# Altium PCB MainPCB.PcbDoc (part 1 of 3)
Units mm, origin at the board's own origin, x right, y up, seen from the top; angles counter-clockwise.
Board outline 200.18 x 193.98 mm, 4 copper layers (Top Layer, PWR, GND, Bottom Layer), stack 1.566 mm thick; 92 components, 81 nets, 391 pads, 267 vias.
Unrouted connection lines stored in the file: 114.
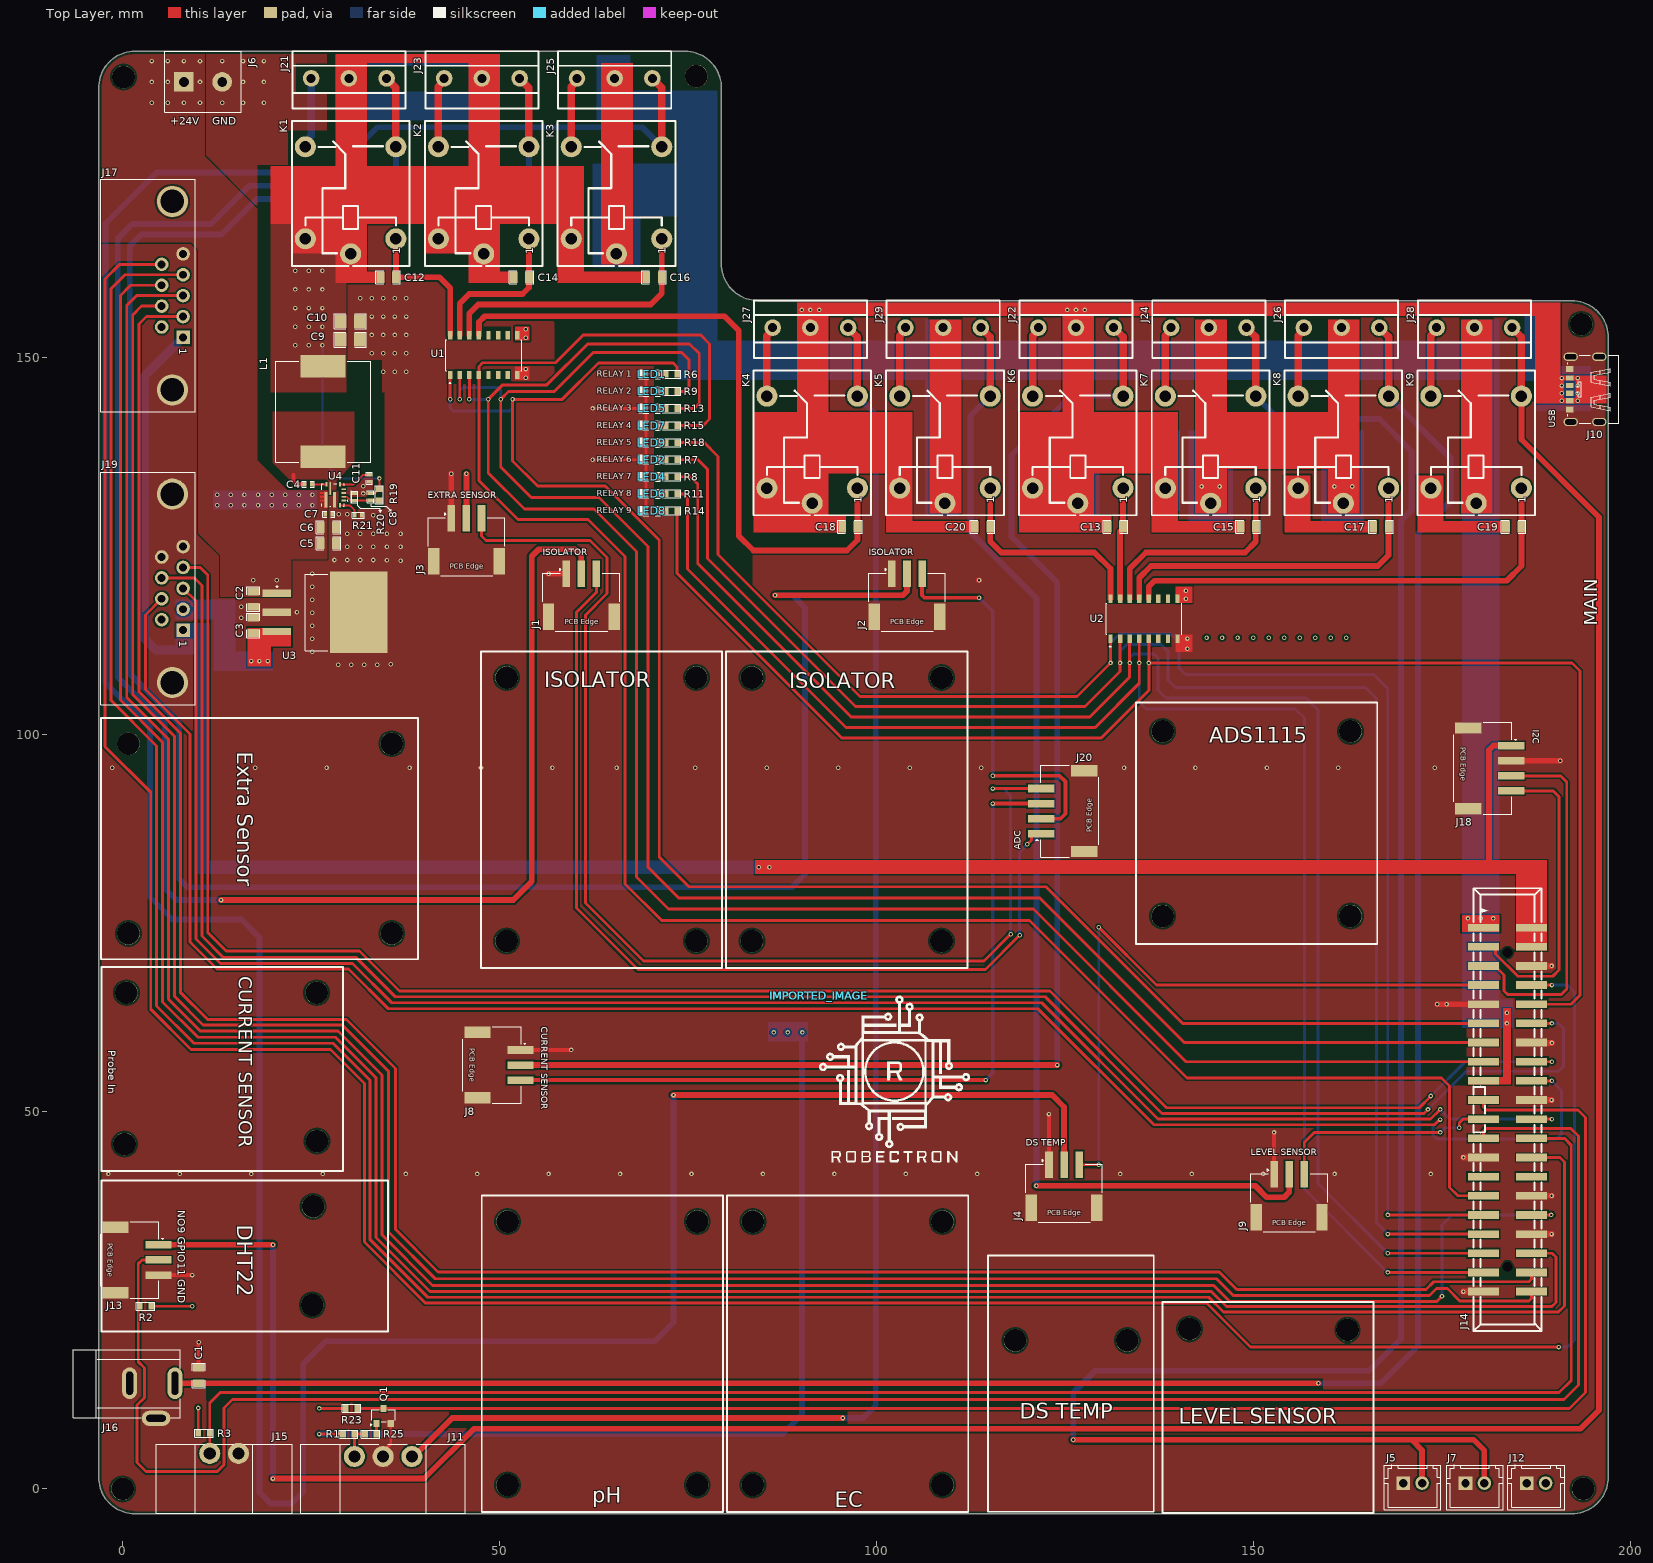
[diagram p0: Top Layer view]
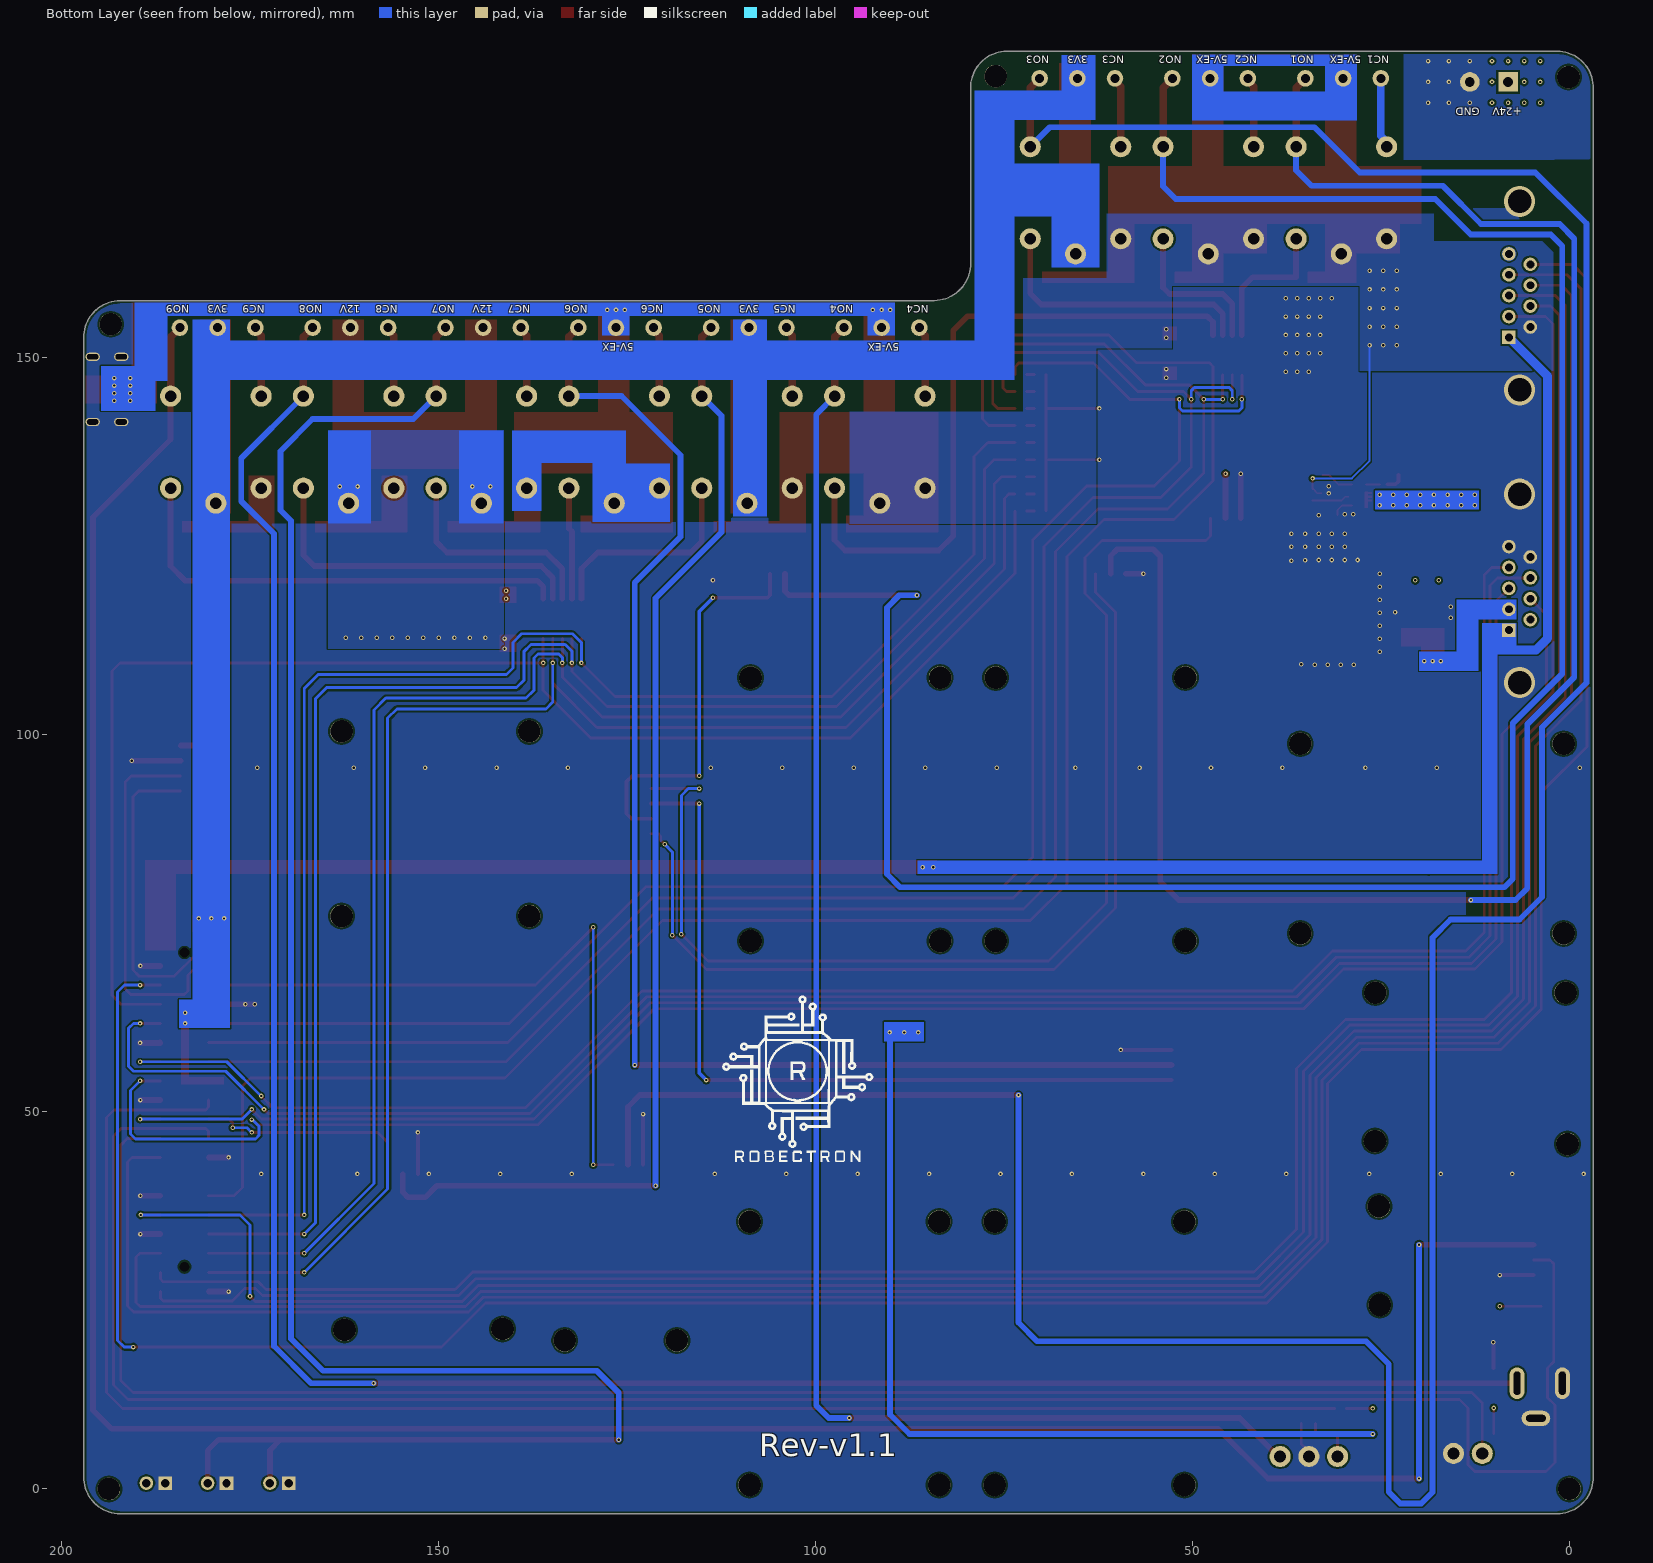
[diagram p1: Bottom Layer view, seen from below]
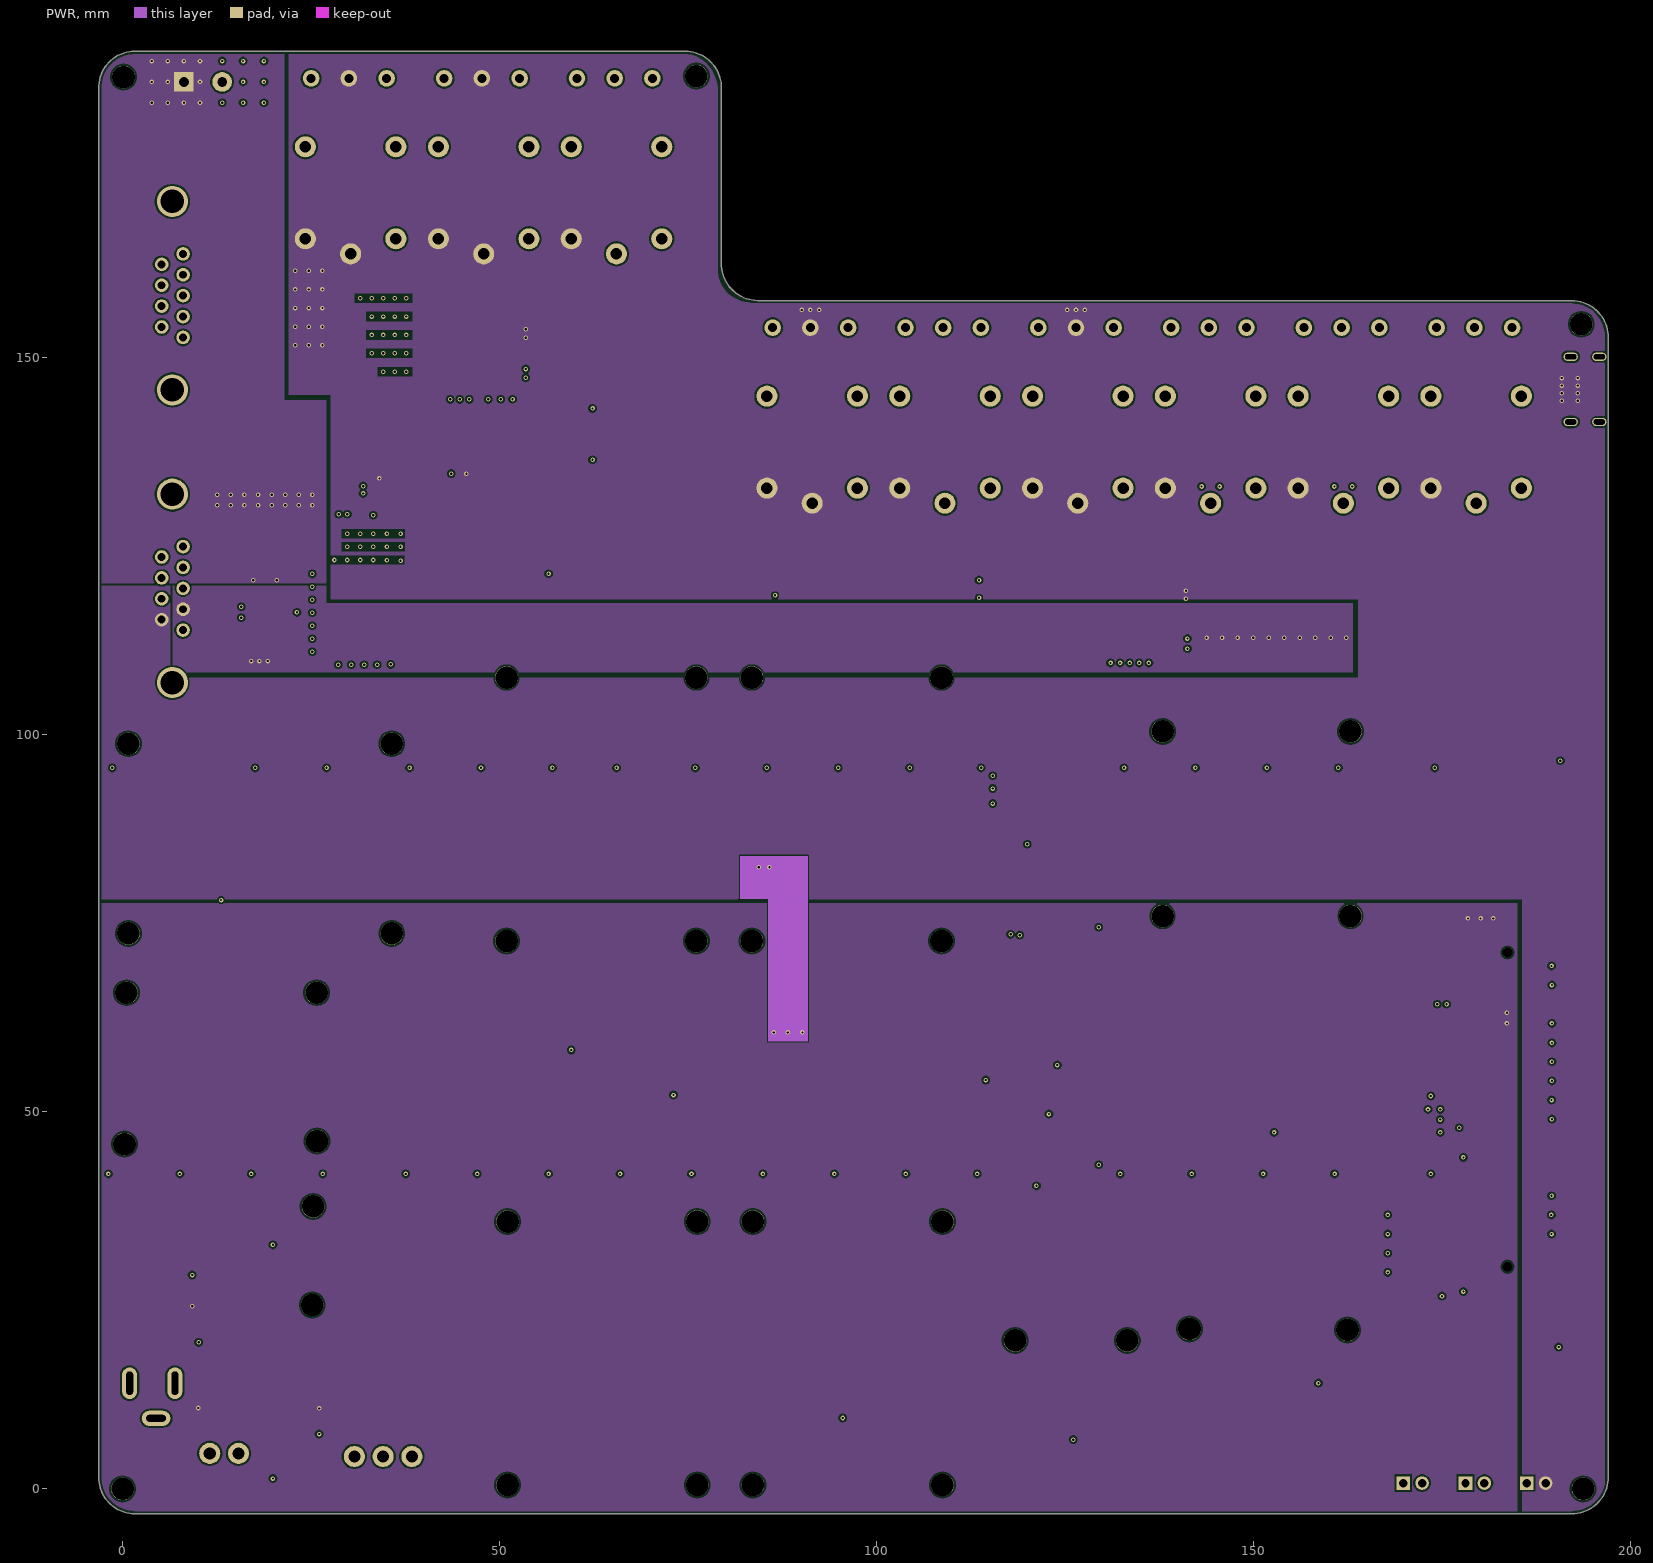
[diagram p2: PWR]
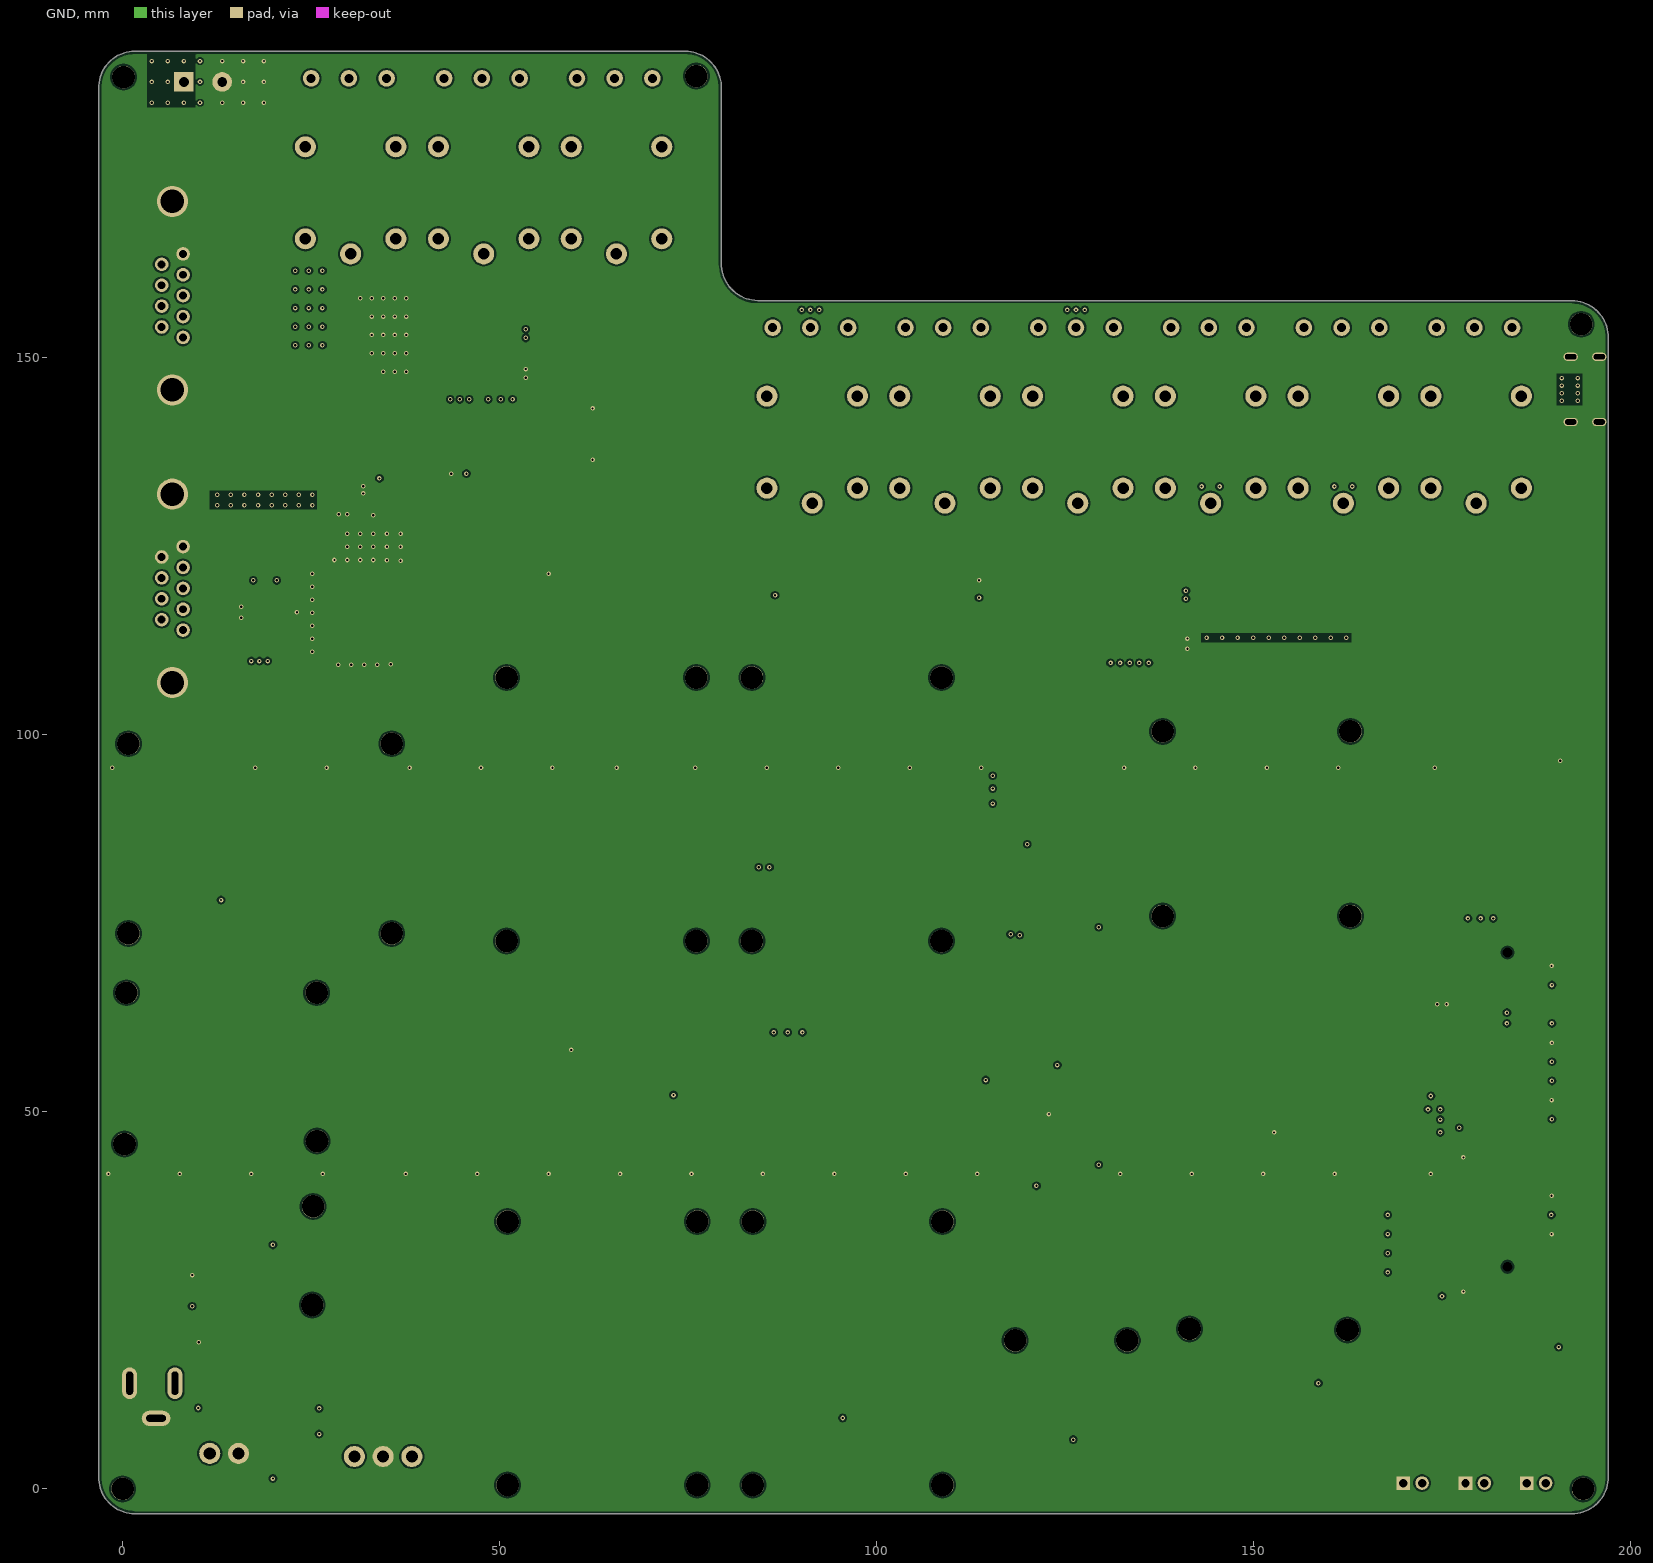
[diagram p3: GND]
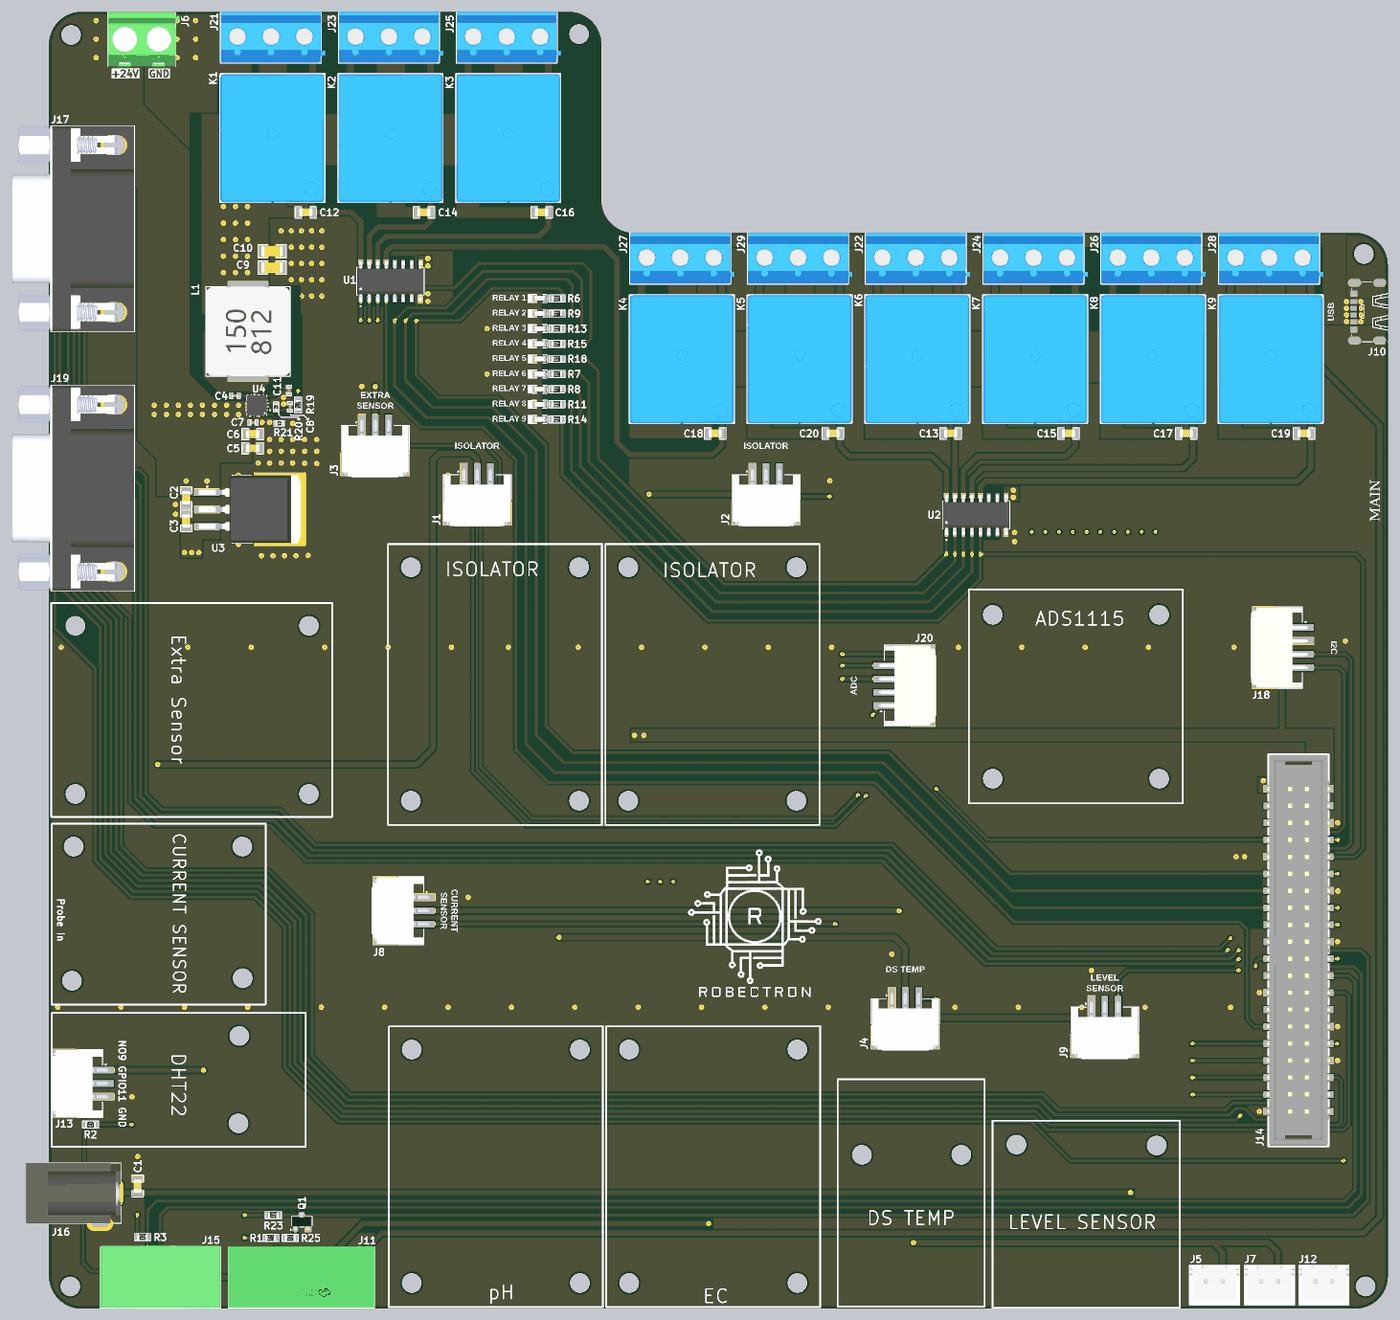
[diagram p5: 3D render of the assembled board from above, using the file's embedded part models]

## Layer stack, top to bottom
Top Solder: solder mask 0.0127, Solder Resist, Dk 3.5
Top Layer: signal copper 0.035
PrePreg 1: prepreg 0.203, PP-006, Dk 4.1
PWR: signal copper 0.03
Core: core 1.03, FR-4, Dk 4.8
GND: signal copper 0.03
PrePreg 2: prepreg 0.203, PP-006, Dk 4.1
Bottom Layer: signal copper 0.035
Bottom Solder: solder mask 0.0127, Solder Resist, Dk 3.5

## Board outline
-3.175,1.629 -3.175,185.698 cw(c1.703,185.774) 1.627,190.652 74.598,190.652 cw(c74.522,185.774) 79.4,185.698 79.4,162.53 ccw(c84.278,162.454) 84.202,157.576 192.198,157.576 cw(c192.122,152.698) 197,152.622 197,1.629 cw(c192.122,1.553) 192.198,-3.325 1.627,-3.325 cw(c1.703,1.553)

## Design rules (kind name [scope] priority, off if disabled: settings)
BoardOutlineClearance [All] p1: gap=0 ignorepadtopadclearanceinfootprint=FALSE except(0.381: Poly-OutlineEdge)
Clearance [All] p1: gap=0.254 ignorepadtopadclearanceinfootprint=FALSE except(0: Arc-Hole Track-Hole SMDPad-Hole THPad-Hole Via-Hole Fill-Hole Poly-Hole Region-Hole Text-Hole; 0.203: Arc-Arc Arc-Track Arc-SMDPad Track-Track Track-SMDPad SMDPad-SMDPad SMDPad-Fill SMDPad-Poly SMDPad-Region Fill-Fill Fill-Poly Fill-Region Poly-Poly Poly-Region Region-Region)
HoleSize [All] p1: absolutevalues=TRUE maxlimit=3.81 minlimit=0.025 maxpercent=80.000 minpercent=20.000
MinimumSolderMaskSliver [All] p1: minsoldermaskwidth=0
PolygonConnect [All] p1: connectstyle=Direct reliefconductorwidth=0.381 reliefentries=4 polygonreliefangle="45 Angle" airgapwidth=0.254
RoutingVias [All] p1: holewidth=0.3 width=0.6 viastyle="Through Hole" minholewidth=0.3 minwidth=0.6 maxholewidth=0.3 maxwidth=0.6
SilkToSilkClearance [All] p1: silktosilkclearance=0
SilkToSolderMaskClearance [IsPad] p1: minsilkscreentomaskgap=0 clearancetoexposedcopper=TRUE
SolderMaskExpansion [All] p1: expansion=0.102 istentingtop=FALSE
UnRoutedNet [All] p1: checkbadconnections=TRUE
Width [All] p1: maxlimit=2 minlimit=0.203 preferedwidth=0.254 midlayer1_minwidth=0.254 midlayer1_maxwidth=0.254 midlayer2_minwidth=0.254 midlayer2_maxwidth=0.254 minimp=50.000000 maximp=50.000000 favimp=50.000000
25 further rules are at their usual default settings.

## Classes and differential pairs
component class U_RelaySheet-v1.1: C12 C13 C14 C15 C16 C17 C18 C19 C20 J21 J22 J23 J24 J25 J26 J27 J28 J29 K1 K2 K3 K4 K5 K6 K7 K8 K9 LED1 LED2 LED3 LED4 LED5 LED6 LED7 LED8 LED9 R6 R7 R8 R9 R11 R13 R14 R15 R18 U1 U2
component class U_ConnectorSheet-v1.1: C1 C2 C3 C4 C5 C6 C7 C8 C9 C10 C11 J1 J2 J3 J4 J5 J6 J7 J8 J9 J10 J11 J12 J13 J14 J15 J16 J17 J18 J19 J20 L1 Q1 R1 R2 R3 R19 R20 R21 R23 R25 U3 U4

## Components (designator, comment, footprint, x,y, rotation, side; value= is the part's Value field where it differs from the comment)
C1 "22uF" Cap-0805 10.084,15.025 r270 top
C2 "10uF" Cap-0805 17.332,117.983 r90 top
C3 "22uF" Cap-0805 17.332,114.503 r270 top
C4 "100nF" cap-0402 24.616,133.209 r180 top
C5 "10uF" Cap-0805 27.279,125.374 r180 top
C6 "10uF" Cap-0805 27.279,127.483 r180 top
C7 "0.1uF" Cap-0402 27.33,129.233 r180 top
C8 "150pF" Cap-0402 32.868,131.547 r90 top
C9 "47uF" Cap-1206 30.175,152.4 r180 top
C10 "47uF" Cap-1206 30.175,154.838 r180 top
C11 "22nF" Cap-0402 32.715,134.01 r90 top
C12 "10uF" Cap-0805 35.223,160.655 r180 top
C13 "10uF" Cap-0805 131.644,127.584 r180 top
C14 "10uF" Cap-0805 52.867,160.655 r180 top
C15 "10uF" Cap-0805 149.252,127.584 r180 top
C16 "10uF" Cap-0805 70.475,160.655 r180 top
C17 "10uF" Cap-0805 166.86,127.584 r180 top
C18 "10uF" Cap-0805 96.427,127.584 r180 top
C19 "10uF" Cap-0805 184.468,127.584 r180 top
C20 "10uF" Cap-0805 114.035,127.584 r180 top
IMPORTED_IMAGE "Comment" IMPORTED_IMAGE 92.364,65.385 r0 top
IMPORTED_IMAGE "Comment" IMPORTED_IMAGE 92.329,65.405 r0 top
J1 "WAFER-PH2.0-3PWB" WAFER-PH2.0-3PWB 60.833,118.491 r0 top
J2 "WAFER-PH2.0-3PWB" WAFER-PH2.0-3PWB 104.013,118.491 r0 top
J3 "WAFER-PH2.0-3PWB" WAFER-PH2.0-3PWB 45.593,125.857 r0 top
J4 "WAFER-PH2.0-3PWB" WAFER-PH2.0-3PWB 124.841,40.132 r0 top
J5 "HX25003-2A" HX25003-2A 171.069,0.762 r0 top locked
J6 "1729128" 1729128 10.668,186.563 r0 top
J7 "HX25003-2A" HX25003-2A 179.324,0.762 r0 top locked
J8 "WAFER-PH2.0-3PWB" WAFER-PH2.0-3PWB 49.911,56.197 r270 top
J9 "WAFER-PH2.0-3PWB" WAFER-PH2.0-3PWB 154.686,38.862 r0 top
J10 "TYPE-C 6P" "TYPE-C 6P" 192.024,141.478 r90 top
J11 "KF2EDGRM-3.81-3P" KF2EDGRM-3.81-3P 34.544,4.293 r0 top locked
J12 "HX25003-2A" HX25003-2A 187.452,0.762 r0 top locked
J13 "WAFER-PH2.0-3PWB" WAFER-PH2.0-3PWB 1.905,30.353 r270 top
J14 "BH-00181" BH-00181 183.642,50.292 r270 top locked
J15 "KF2EDGRM-3.81-2P" KF2EDGRM-3.81-2P 13.462,4.699 r0 top locked
J16 "DC-005-20A" DC-005-20A 3.937,11.684 r0 top locked
J17 "A-DF 09 A/KG-T2S" "A-DF 09 A/KG-T2S" 6.604,158.222 r270 top locked
J18 "WAFER-PH2.0-4PWB" WAFER-PH2.0-4PWB 184.15,98.552 r270 top
J19 "A-DF 09 A/KG-T2S" "A-DF 09 A/KG-T2S" 6.604,119.412 r270 top locked
J20 "WAFER-PH2.0-4PWB" WAFER-PH2.0-4PWB 121.793,86.868 r90 top
J21 "XY301V-A-5.0-3P" XY301V-A-5.0-3P 30.003,187.038 r0 top
J22 "XY301V-A-5.0-3P" XY301V-A-5.0-3P 126.423,153.976 r0 top
J23 "XY301V-A-5.0-3P" XY301V-A-5.0-3P 47.646,187.038 r0 top
J24 "XY301V-A-5.0-3P" XY301V-A-5.0-3P 144.031,153.976 r0 top
J25 "XY301V-A-5.0-3P" XY301V-A-5.0-3P 65.255,187.038 r0 top
J26 "XY301V-A-5.0-3P" XY301V-A-5.0-3P 161.64,153.976 r0 top
J27 "XY301V-A-5.0-3P" XY301V-A-5.0-3P 91.207,153.976 r0 top
J28 "XY301V-A-5.0-3P" XY301V-A-5.0-3P 179.248,153.976 r0 top
J29 "XY301V-A-5.0-3P" XY301V-A-5.0-3P 108.815,153.976 r0 top
K1 "SRD-05VDC-SL-C" SRD-05VDC-SL-C 30.239,170.864 r90 top
K2 "SRD-05VDC-SL-C" SRD-05VDC-SL-C 47.883,170.864 r90 top
K3 "SRD-05VDC-SL-C" SRD-05VDC-SL-C 65.491,170.864 r90 top
K4 "SRD-05VDC-SL-C" SRD-05VDC-SL-C 91.443,137.801 r90 top
K5 "SRD-05VDC-SL-C" SRD-05VDC-SL-C 109.051,137.801 r90 top
K6 "SRD-05VDC-SL-C" SRD-05VDC-SL-C 126.66,137.801 r90 top
K7 "SRD-05VDC-SL-C" SRD-05VDC-SL-C 144.268,137.801 r90 top
K8 "SRD-05VDC-SL-C" SRD-05VDC-SL-C 161.876,137.801 r90 top
K9 "SRD-05VDC-SL-C" SRD-05VDC-SL-C 179.484,137.801 r90 top
L1 "4.7uH" SMD,13.5x12.6mm 26.568,142.85 r90 top locked
LED1 "LTST-C193KRKT-5A" LED-0603 70.168,147.789 r180 top
LED2 "LTST-C193KRKT-5A" LED-0603 70.168,136.471 r180 top
LED3 "LTST-C193KRKT-5A" LED-0603 70.168,145.525 r180 top
LED4 "LTST-C193KRKT-5A" LED-0603 70.168,134.208 r180 top
LED5 "LTST-C193KRKT-5A" LED-0603 70.168,143.262 r180 top
LED6 "LTST-C193KRKT-5A" LED-0603 70.168,131.944 r180 top
LED7 "LTST-C193KRKT-5A" LED-0603 70.168,140.998 r180 top
LED8 "LTST-C193KRKT-5A" LED-0603 70.168,129.681 r180 top
LED9 "LTST-C193KRKT-5A" LED-0603 70.168,138.735 r180 top
Q1 "MMBT2222A-7-F" SOT-23 34.608,9.661 r0 top locked
R1 "10K" Res-0603 29.972,7.264 r180 top locked value=10kR
R2 "4.7K" Res-0603 3.023,24.207 r180 top
R3 "10K" Res-0603 10.795,7.366 r0 top
R6 "220R" Res-0603 72.771,147.789 r0 top
R7 "220R" Res-0603 72.771,136.471 r0 top
R8 "220R" Res-0603 72.771,134.208 r0 top
R9 "220R" Res-0603 72.771,145.525 r0 top
R11 "220R" Res-0603 72.771,131.944 r0 top
R13 "220R" Res-0603 72.771,143.262 r0 top
R14 "220R" Res-0603 72.771,129.681 r0 top
R15 "220R" Res-0603 72.771,140.998 r0 top
R18 "220R" Res-0603 72.771,138.735 r0 top
R19 "30K" Res-0603 34.061,131.826 r90 top
R20 "4.12K" Res-0402 30.763,131.529 r270 top value=4.12kR
R21 "30.1K" Res-0402 31.233,129.102 r180 top
R23 "10K" Res-0603 30.353,10.661 r0 top locked value=10kR
R25 "1.1k" Res-0603 32.896,7.264 r0 top locked
U1 "ULN2003AIDR" "16-SOIC (0.154\", 3.90mm Width)" 47.883,150.343 r90 top
U2 "ULN2003AIDR" "16-SOIC (0.154\", 3.90mm Width)" 135.445,115.394 r90 top locked
U3 "LM340SX-12/NOPB" "TO-263 (DDPAK-3)" 25.888,116.23 r270 top
U4 "TPS56837HRPAR" "10-VQFN-HR (3x3)" 28.128,131.809 r180 top

## Footprints (in the part's own frame and the unit in brackets; to place one, negate y for a bottom-side part, rotate by r counter-clockwise, add the part's x,y. Pads: shape width x height; smd on the part's side, far side on the other; paste and mask are expansions set on the pad)
"10-VQFN-HR (3x3)" [mm]
  rect 0.6x0.25 smd paste+0 mask+0.07: 1(-1.175,0.75) 2(-1.175,0.25) 3(-1.175,-0.25) 4(-1.175,-0.75)
  rect 0.25x0.6 smd paste+0 mask+0.07: 5(-0.705,-1.4) 7(1.095,-1.4) 10(-0.705,1.4)
  rect 0.25x1.7 smd paste+0 mask+0.07: 6(0.595,-0.85)
  rrect50% 0.4x2.1 smd mask+0.07: 8(1.175,0.65)
  rect 0.4x2.1 smd paste+0 mask+0.07: 9(0.015,0.65)
  Top Layer region: 287 vertices and 0 holes, not listed, extent 0.975,-0.4 1.936,1.7
  silkscreen extent -1.76,-1.5 1.73,1.5, body extent -1.27,-1.5 1.73,1.5, height 1
"16-SOIC (0.154\", 3.90mm Width)" [mm]
  rect 1.12x0.58 smd: 1(-2.64,4.445) 2(-2.64,3.175) 3(-2.64,1.905) 4(-2.64,0.635) 5(-2.64,-0.635) 6(-2.64,-1.905) 7(-2.64,-3.175) 8(-2.64,-4.445) 9(2.64,-4.445) 10(2.64,-3.175) 11(2.64,-1.905) 12(2.64,-0.635) 13(2.64,0.635) 14(2.64,1.905) 15(2.64,3.175) 16(2.64,4.445)
  silkscreen extent -3.74,-5.03 2.06,5.03, body extent -3,-4.95 3,4.95, height 1.75
1729128 [mm]
  rect 2.6x2.6 hole 1.32: 1(-2.54,0)
  round 2.6 hole 1.3: 2(2.54,0)
  silkscreen extent -5.08,-4.05 5.08,4.1, body extent -5.06,-4.09 5.67,4.06, height 9.97
"A-DF 09 A/KG-T2S" [mm]
  rect 1.8x1.8 / inner round 1.8 / far side rect 1.8x1.8 hole 1.05: 1(5.54,1.42)
  round 1.8 hole 1.05: 2(2.77,1.42) 3(0,1.42) 4(-2.77,1.42) 5(-5.54,1.42) 6(4.155,-1.42) 7(1.385,-1.42) 8(-1.385,-1.42) 9(-4.155,-1.42)
  round 4.116 hole 3.1: S1(-12.495,0) S2(12.495,0)
  silkscreen extent -15.41,-9.5 15.41,3, body extent -15.41,-15.4 15.41,2.9, height 12.8
BH-00181 [mm]
  rect 1.02x4.1 smd paste+0 mask+0.05: 1(-24.13,-3.2) 2(-24.13,3.2) 3(-21.59,-3.2) 4(-21.59,3.2) 5(-19.05,-3.2) 6(-19.05,3.2) 7(-16.51,-3.2) 8(-16.51,3.2) 9(-13.97,-3.2) 10(-13.97,3.2) 11(-11.43,-3.2) 12(-11.43,3.2) 13(-8.89,-3.2) 14(-8.89,3.2) 15(-6.35,-3.2) 16(-6.35,3.2) 17(-3.81,-3.2) 18(-3.81,3.2) 19(-1.27,-3.2) 20(-1.27,3.2) 21(1.27,-3.2) 22(1.27,3.2) 23(3.81,-3.2) 24(3.81,3.2) 25(6.35,-3.2) 26(6.35,3.2) 27(8.89,-3.2) 28(8.89,3.2) 29(11.43,-3.2) 30(11.43,3.2) 31(13.97,-3.2) 32(13.97,3.2) 33(16.51,-3.2) 34(16.51,3.2) 35(19.05,-3.2) 36(19.05,3.2) 37(21.59,-3.2) 38(21.59,3.2) 39(24.13,-3.2) 40(24.13,3.2)
  round 0 hole 1.3 unplated paste+0: ""(-20.835,0) ""(20.835,0)
  silkscreen extent -29.35,-4.5 29.35,4.5, body extent -29.2,-4.75 29.2,4.75, height 10.5
cap-0402 [mil]
  rect 18x25 smd mask+2.36: 1(-18.5,0) 2(18.5,0)
  silkscreen extent -31,-16 31,16, body extent -20,-10 20,10, height 19
Cap-0402 [mil]
  rect 18x25 smd mask+2.36: 1(-18.5,0) 2(18.5,0)
  silkscreen extent -31,-16 31,16, body extent -20,-10 20,10, height 19
Cap-0805 [mil] "SMD 0805"
  rect 40x60 smd mask+2.76: 1(-40,0) 2(40,0)
  silkscreen extent -64,-34 64,34, body extent -39,-25 39,25, height 30
Cap-1206 [mil] "SMD 1206"
  rect 60x70 smd: 1(-50,0) 2(50,0)
  silkscreen extent -84,-39 84,39, body extent -63,-31 63,32, height 39
DC-005-20A [mm]
  oval 2x4.2 hole 0.9 slot 3.1 at 90 deg copper offset 0.001,0 paste+0 mask+0.051: 1(2.999,2.325)
  oval 2x4.2 hole 0.9 slot 3.1 at 90 deg copper offset 0,0 paste+0 mask+0.051: 2(-2.999,2.325)
  oval 3.8x2 hole 0.9 slot 2.6 at 0 deg copper offset 0.001,0 paste+0 mask+0.051: 3(0.499,-2.325)
  silkscreen extent -10.51,-2.24 3.71,6.78, body extent -10.5,-2.53 3.6,6.77, height 9.9
HX25003-2A [mm]
  rect 1.8x1.8 hole 1.1 paste+0 mask+0.05: 1(-1.25,0)
  round 1.8 hole 1.1 paste+0 mask+0.05: 2(1.25,0)
  silkscreen extent -3.75,-3.55 3.75,2.41, body extent -3.75,-3.5 3.75,2.4, height 7.3
IMPORTED_IMAGE [mm]
  silkscreen extent 0,-22.06 20,0
KF2EDGRM-3.81-2P [mm]
  round 2.8 hole 1.6 paste+0 mask+0.051: 1(-1.905,0) 2(1.905,0)
  silkscreen extent -9.01,-7.95 9.01,1.25, body extent -9.01,-7.95 9.01,1.35, height 6.9
KF2EDGRM-3.81-3P [mm]
  round 2.8 hole 1.6 paste+0 mask+0.051: 1(-3.81,0) 2(0,0) 3(3.81,0)
  silkscreen extent -10.91,-7.54 10.92,1.66, body extent -10.91,-7.47 10.91,1.68, height 7
LED-0603 [mm]
  rect 0.5x1 smd: 1(-0.75,0) 2(0.75,0)
  silkscreen extent -1.12,-0.66 1.75,0.66, body extent -0.82,-0.37 0.82,0.36, height 0.68
Res-0402 [mil]
  rect 18x25 smd mask+2.17: 1(-18.5,0) 2(18.5,0)
  silkscreen extent -32,-17 32,16, body extent -23,-11 23,11, height 16
Res-0603 [mil]
  rect 30x35 smd: 1(-30,0) 2(30,0)
  silkscreen extent -48,-21 48,21, body extent -31,-17 31,17, height 18
SMD,13.5x12.6mm [mm]
  rect 3x6 smd paste+0 mask+0.051: 1(-6,0) 2(6,0)
  silkscreen extent -6.71,-6.33 6.69,6.28, body extent -6.73,-6.3 6.73,6.3, height 4.81
SOT-23 [mm] "TRANS NPN 40V 0.6A SOT23"
  rect 0.82x0.92 smd: 1(-0.95,-1) 2(0.95,-1) 3(0,1)
  silkscreen extent -1.68,-1.3 1.55,0.81, body extent -1.5,-1.25 1.5,1.25, height 1.05
SRD-05VDC-SL-C [mil]
  round 110 hole 60 paste+0 mask+2: 1(-200.79,-236.22) 2(279.52,-236.2) 3(279.53,236.2) 4(-200.79,236.22) 5(-279.53,0)
  silkscreen extent -342,-307 413,307, body extent -343,-307 413,307, height 642
"TO-263 (DDPAK-3)" [mm]
  rect 0.99x3.79 smd: 1(-2.54,-5.44) 2(0,-5.44) 3(2.54,-5.44)
  rect 10.84x7.62 smd paste-6: 4(0,5.44)
  silkscreen extent -5.08,-5.54 5.08,1.31, body extent -5.08,-6.68 5.08,8.56, height 4.83
"TYPE-C 6P" [mm]
  oval 1.1x1.9 hole 0.7 slot 1.5 at 90 deg paste+0 mask+0.051: 7(0,0) 7(0,-3.8) 7(8.64,-3.8) 7(8.64,0)
  rect 0.7x1 smd paste-100 mask+0.051: A5(3.82,0.125) A9(5.82,0.125) B5(4.82,0.125) B9(2.82,0.125)
  rect 0.8x1 smd paste-100 mask+0.051: A12(7.02,0.125) B12(1.62,0.125)
  silkscreen extent -0.18,-6.4 8.82,0.4
WAFER-PH2.0-3PWB [mm]
  rect 1x3.5 smd: 1(-2,2.85) 2(0,2.85) 3(2,2.85)
  rect 1.5x3.5 smd: MP1(-4.35,-2.85) MP2(4.35,-2.85)
  silkscreen extent -5.09,-4.78 5.09,3.56, body extent -5,-4.72 5,3.78, height 5.53
WAFER-PH2.0-4PWB [mm]
  rect 1x3.5 smd: 1(0,0) 2(2,0) 3(4,0) 4(6,0)
  rect 1.5x3.5 smd: MP1(-2.35,-5.7) MP2(8.35,-5.7)
  silkscreen extent -3.09,-7.63 9.09,0.71, body extent -3,-7.57 9,0.91, height 5.59
XY301V-A-5.0-3P [mm]
  round 2.2 hole 1.2 paste+0 mask+0.051: 1(-5,0) 2(0,0) 3(5,0)
  silkscreen extent -7.5,-4 7.5,3.6, body extent -7.5,-4 8.1,3.6, height 10.3

## Part data
C1 C3: library part C2012X5R1V226MT000E, "CAP CER 22UF 35V X5R 0805", LCSC Part Number=C338080, Manufacturer="TDK Corporation", Package=0805, ComponentLink1Description=LCSC, ComponentLink1URL=https://www.lcsc.com/product-detail/Multilayer-Ceramic-Capacitors-MLCC-SMD-SMT_TDK-C2012X5R1V226M125AC_C2179409.html, Item Type=Capacitor, Manufacturer Part Number=C2012X5R1V226MT000E
C2 C5 C6 C12 C13 C14 C15 C16 C17 C18 C19 C20: library part GRM21BR61H106ME43L, "CAP CER 10UF 50V X5R 0805", LCSC Part Number=C2190942, Manufacturer=Murata, Supplier Part Number 1=490-18664-1-ND, Category="Ceramic Capacitors", Manufacturer Part Number=GRM21BR61H106ME43L, Pricing 1="1=0.44000, 10=0.30700, 50=0.21500, 100=0.18420, 500=0.13818, 1000=0.11668 (USD)", RoHS=Yes, Stock 1=26, Supplier 1=Digi-Key
C4: library part C1005X7R1H104KT000F, "CAP CER 0.1UF 50V X7R 0402", Dielectric=X7R, LCSC Part Number=C361198, Manufacturer=TDK, Tolerance=10%, Voltage=25V, Category="Ceramic Capacitors", ComponentLink1Description=LCSC, ComponentLink1URL=https://www.lcsc.com/product-detail/Multilayer-Ceramic-Capacitors-MLCC-SMD-SMT_TDK-C1005X7R1H104KT000F_C361198.html, Item Type=Capacitor, Manufacturer Part Number=C1005X7R1H104KT000F, RoHS=No, Supplier 1=Avnet, Supplier Part Number 1=C1005X7R1H104KT000F
C7: library part C1005X5R1H104K050BB, "CAP CER 0.1UF 50V X5R 0402", Capacitance=100nF, Case Code (Imperial)=0402, Case Code (Metric)=1005, Dielectric=X5R, Dielectric Material=Ceramic, LCSC Part Number=C2181865, Manufacturer=TDK, Max Operating Temperature=85°C, Min Operating Temperature=-55°C, Package Quantity=1, Supplier Part Number 1=445-5942-1-ND, Tolerance=10%, Voltage=50V, Case/Package=0402, ComponentLink1Description=https://product.tdk.com/info/en/catalog/spec/mlccspec_commercial_general_midvoltage_en.pdf?src-supplier=Digi-Key, ComponentLink1URL=https://product.tdk.com/info/en/catalog/spec/mlccspec_commercial_general_midvoltage_en.pdf?src-supplier=Digi-Key, ComponentLink2Description=http://www.tdk.co.jp/tefe02/e413_c.pdf?src-supplier=Future+Electronics, ComponentLink2URL=http://www.tdk.co.jp/tefe02/e413_c.pdf?src-supplier=Future+Electronics, ComponentLink3Description=https://www.verical.com/server-webapp/html/getDatasheet?partID=743571&src-supplier=Verical, ComponentLink3URL=https://www.verical.com/server-webapp/html/getDatasheet?partID=743571&src-supplier=Verical, ComponentLink4Description=http://www.tdk.co.jp/tefe02/e412_c.pdf?src-supplier=Avnet+Europe, ComponentLink4URL=http://www.tdk.co.jp/tefe02/e412_c.pdf?src-supplier=Avnet+Europe, Construction=Flat, Depth=0.5mm, Height=0.5mm, Item Type=Capacitor, Lead Free="Lead Free", Length=1mm, Manufacturer Part Number=C1005X5R1H104K050BB, Mount="Surface Mount", Packaging="Tape and Reel", Pricing 1="1=0.12, 10=0.09, 50=0.049, 100=0.04, 500=0.02858, 1000=0.02245, 2500=0.02041, 5000=0.01878 (USD)", Radiation Hardening=No, REACH SVHC="No SVHC", Resistor Type=Ceramic, RoHS Compliant=Yes, Series=C, Stock 1=1455182, Supplier 1=Digi-Key, Termination=SMD/SMT, Thickness=0.022inch, Voltage Rating=50V, Voltage Rating (DC)=50V, Weight=2.3E-05oz, Width=0.02inch
C8: library part CC0402KRX7R8BB151, "CAP CER 150PF 25V X7R 0402", Case Code (Imperial)=0402, Case Code (Metric)=1005, Dielectric=X7R, LCSC Part Number=C541384, Manufacturer=Yageo, Max Operating Temperature=125°C, Min Operating Temperature=-55°C, Supplier Part Number=2069488, Tolerance=10%, Voltage Rating=25V, Case/Package=0402, Category="Ceramic Capacitors", ComponentLink1Description=https://datasheet.ciiva.com/13210/upy-gphc-x7r-6-3v-to-50v-8-12304-13210062.pdf?src-supplier=Mouser, ComponentLink1URL=https://datasheet.ciiva.com/13210/upy-gphc-x7r-6-3v-to-50v-8-12304-13210062.pdf?src-supplier=Mouser, Halogen Free="Halogen Free", Item Type=Capacitor, Lead Free="Lead Free", Length=0.039inch, Manufacturer Part Number=CC0402KRX7R8BB151, Mounting Technology="Surface Mount", Packaging="Tape and Reel", Pricing="10000=0.0032, 40000=0.003, 150000=0.0029, 400000=0.0028, 1000000=0.0026 (USD)", RoHS=Yes, RoHS Compliant=Yes, Series=CC, Stock=40000, Supplier="Future Electronics", Termination=SMD/SMT, Thickness=0.022inch, Voltage Rating (DC)=25V, Weight=2.3E-05oz, Width=0.02inch
C9 C10: library part C3216X5R1E476M160AC, "CAP CER 47UF 25V X5R 1206", Case Code (Imperial)=1206, Case Code (Metric)=3216, Dielectric=X5R, Dielectric Material=Ceramic, LCSC Part Number=C2167787, Manufacturer=TDK, Max Operating Temperature=85°C, Min Operating Temperature=-55°C, Package Quantity=1, Supplier Part Number 1=445-8047-1-ND, Tolerance=20%, Voltage=25V, Capacitance=47uF, Case/Package=1206, ComponentLink1Description=https://product.tdk.com/info/en/catalog/datasheets/mlcc_commercial_general_en.pdf?src-supplier=Digi-Key, ComponentLink1URL=https://product.tdk.com/info/en/catalog/datasheets/mlcc_commercial_general_en.pdf?src-supplier=Digi-Key, ComponentLink2Description=https://product.tdk.com/info/en/documents/chara_sheet/C3216X5R1E476M160AC.pdf?src-supplier=Digi-Key, ComponentLink2URL=https://product.tdk.com/info/en/documents/chara_sheet/C3216X5R1E476M160AC.pdf?src-supplier=Digi-Key, ComponentLink3Description=http://www.tdk.com/pdf/general_B11.pdf?src-supplier=Future+Electronics, ComponentLink3URL=http://www.tdk.com/pdf/general_B11.pdf?src-supplier=Future+Electronics, Depth=1.6mm, Height=1.6mm, Lead Free="Lead Free", Length=0.126inch, Manufacturer Part Number=C3216X5R1E476M160AC, Mount="Surface Mount", Packaging="Tape and Reel", Pricing 1="1=1.09, 10=0.862, 50=0.7476, 100=0.6469, 500=0.48876, 1000=0.43125 (USD)", REACH SVHC="No SVHC", Resistor Type=Ceramic, Series=C, Stock 1=886163, Supplier 1=Digi-Key, Termination=SMD/SMT, Thickness=0.071inch, Voltage Rating=25V, Voltage Rating (DC)=25V, Weight=0.000571oz, Width=0.063inch
C11: library part CC0402KRX5R7BB223, "CAP CER 0.022UF 16V X5R 0402", Case Code (Imperial)=0402, Case Code (Metric)=1005, Dielectric=X5R, LCSC Part Number=C541399, Manufacturer=Yageo, Max Operating Temperature=85°C, Min Operating Temperature=-55°C, Supplier Part Number 1=603-CC402KRX5R7BB223, Tolerance=10%, Voltage Rating=16V, Capacitance=22nF, Case/Package=0402, Category="Ceramic Capacitors", ComponentLink1Description=http://www.yageo.com/exep/pages/download/literatures/ProductSelectionGuide%202014_Final_2.pdf?src-supplier=Digi-Key, ComponentLink1URL=http://www.yageo.com/exep/pages/download/literatures/ProductSelectionGuide%202014_Final_2.pdf?src-supplier=Digi-Key, ComponentLink2Description=http://www.yageo.com/documents/recent/UPY-GPHC_X5R_4V-to-50V_25.pdf?src-supplier=Digi-Key, ComponentLink2URL=http://www.yageo.com/documents/recent/UPY-GPHC_X5R_4V-to-50V_25.pdf?src-supplier=Digi-Key, Halogen Free="Halogen Free", Lead Free="Lead Free", Length=0.039inch, Manufacturer Part Number=CC0402KRX5R7BB223, Mount="Surface Mount", Packaging="Tape and Reel", Pricing 1="1=0.10000, 10=0.05600, 50=0.05600, 100=0.02500, 1000=0.01400, 10000=0.01000 (USD)", RoHS=Yes, RoHS Compliant=Yes, Stock 1=31160, Supplier 1=Mouser, Thickness=0.022inch, Voltage Rating (DC)=16V, Width=0.02inch
J1 J2 J3 J4 J8 J9 J13: "1x3P 3P 1 2mm 3 -25℃~+85℃ 2A Surface Mount，Right Angle SMD,P=2mm,Surface Mount，Right Angle Wire To Board Connector ROHS", LCSC Part Number=C3029441, ComponentLink1Description=LCSC, ComponentLink1URL=https://www.lcsc.com/product-detail/Wire-To-Board-Connector_XUNPU-WAFER-PH2-0-3PWB_C3029441.html, Item Type=Connector, Manuacturer=XUNPU, Manufacturer Part Number=WAFER-PH2.0-3PWB
J5 J7 J12: "1x2P 2P XH 1 2.5mm 2 Straight Plugin,P=2.5mm Wire To Board Connector ROHS", LCSC Part Number=C442299, Manufacturer=HX, Package=Plugin,P=2.5mm, ComponentLink1Description=LCSC, ComponentLink1URL=https://www.lcsc.com/product-detail/Wire-To-Board-Connector_HX-Zhejiang-Yueqing-Hongxing-Elec-HX25003-2A_C442299.html, Item Type="Wire To Board Connector", Manufacturer Part Number=HX25003-2A
J6: "TERM BLK 2P SIDE ENT 5.08MM PCB", Color=Green, Current=10A, Current Rating=13.5A, Flammability Rating="UL94 V-0", Manufacturer="Phoenix Contact", Max Supply Voltage=400V, Package Quantity=50, Supplier Part Number=277-1247-ND, Voltage=300V, Approvals=UL,CSA, ComponentLink1Description=https://datasheet.ciiva.com/16046/1729128-16046181.pdf?src-supplier=Onlinecomponents.com, ComponentLink1URL=https://datasheet.ciiva.com/16046/1729128-16046181.pdf?src-supplier=Onlinecomponents.com, ComponentLink2Description=https://datasheet.ciiva.com/15169/getdatasheetpartid-199310-15169845.pdf?src-supplier=Verical, ComponentLink2URL=https://datasheet.ciiva.com/15169/getdatasheetpartid-199310-15169845.pdf?src-supplier=Verical, ComponentLink3Description=https://datasheet.ciiva.com/823/1729128-823779.pdf?src-supplier=Digikey, ComponentLink3URL=https://datasheet.ciiva.com/823/1729128-823779.pdf?src-supplier=Digikey, ComponentLink4Description=https://datasheet.ciiva.com/14607/70054405-14607157.pdf?src-supplier=Allied+Electronics, ComponentLink4URL=https://datasheet.ciiva.com/14607/70054405-14607157.pdf?src-supplier=Allied+Electronics, ComponentLink5Description=https://datasheet.ciiva.com/29218/743664-da-01-en-printklemmenblock-mkdsn-1-5-2-5-08-29218154.pdf?src-supplier=Conrad, ComponentLink5URL=https://datasheet.ciiva.com/29218/743664-da-01-en-printklemmenblock-mkdsn-1-5-2-5-08-29218154.pdf?src-supplier=Conrad, Connector Type=Screw, Contact Material=Tin, Depth=8.1mm, Height=13.5mm, Housing Color=Green, Housing Material=Polyamide, Insulation Material=Nylon, Item Type="Terminal Blocks", Lead Free="Lead Free", Length=8.1mm, Manufacturer Part Number=1729128, Max Current Rating=13.5A, Mounting Technology="Through Hole", Number of Circuits=2, Number of Contacts=2, Number of Levels=1, Number of Poles=2, Number of Positions=2, Number of Positions Per Level=2, Number of Rows=1, Orientation=Straight, Packaging=Bulk, Pins=2, Pitch=5.08mm, Pricing="1=0.77 (USD)", Radiation Hardening=No, Reach SVHC Compliant=No, RoHS=Yes, RoHS Compliant=Yes, Series=MKDSN, Stock=33086, Supplier=Digikey, Termination=Solder, Voltage Rating=400V, Weight=0.069842oz, Width=13.5mm, Wire Gauge (Max)=26AWG, Wire Gauge (Min)=14AWG, Wire/Cable Gauge=26AWG
J10: "1 Surface Mount，Right Angle 6P Female -40℃~+85℃ Type-C SMD USB Connectors ROHS", LCSC Part Number=C456012, Manufacturer="SHOU HAN", Package=SMD, ComponentLink1Description=LCSC, ComponentLink1URL=https://www.lcsc.com/product-detail/USB-Connectors_SHOU-HAN-TYPE-C-6P_C456012.html, Item Type="Type-C SMD", Manufacturer Part Number="TYPE-C 6P"
J11: "300V 8A 3 Bend -40℃~+105℃ 1 3.81mm 1x3P Green Board Edge/Receptacle-Close Screw fixed Push-Pull,P=3.81mm Pluggable System Terminal Block ROHS", LCSC Part Number=C441269, Manufacturer="Cixi Kefa Elec", Package=Push-Pull,P=3.81mm, ComponentLink1Description=LCSC, ComponentLink1URL=https://www.lcsc.com/product-detail/Pluggable-System-Terminal-Block_Cixi-Kefa-Elec-KF2EDGRM-3-81-3P_C441269.html, Item Type="Terminal Block", Manufacturer Part Number=KF2EDGRM-3.81-3P
J14: "2.54mm -40℃~+105℃ Brick nogging 3A 2x20P 20 Push - Pull 2.54mm 2 SMD,P=2.54mm IDC Connectors ROHS", LCSC Part Number=C2685075, Manufacturer=Liansheng, Package=SMD,P=2.54mm, ComponentLink1Description=LCSC, ComponentLink1URL=https://www.lcsc.com/product-detail/IDC-Connectors_Liansheng-BH-00181_C2685075.html, Item Type="IDC Connector", Manufacturer Part Number=BH-00181
J15: "300V 8A 2 Bend -40℃~+105℃ 1 3.81mm 1x2P Green Board Edge/Receptacle-Close Screw fixed Push-Pull,P=3.81mm Pluggable System Terminal Block ROHS", LCSC Part Number=C441268, Manufacturer="Cixi Kefa Elec", Package=Push-Pull,P=3.81mm, ComponentLink1Description=LCSC, ComponentLink1URL=https://www.lcsc.com/product-detail/Pluggable-System-Terminal-Block_Cixi-Kefa-Elec-KF2EDGRM-3-81-2P_C441268.html, Item Type="Terminal Block", Manufacturer Part Number=KF2EDGRM-3.81-2P
J16: "2mm 6.4mm 500mA 30V Plugin DC Power Connector ROHS", LCSC Part Number=C136744, Manufacturer="Korean Hroparts Elec", Package=Plugin, ComponentLink1Description=LCSC, ComponentLink1URL=https://www.lcsc.com/product-detail/DC-Power-Connector_Korean-Hroparts-Elec-DC-005-20A_C136744.html, Item Type="DC Power Connector", Manufacturer Part Number=DC-005-20A
J17 J19: "CONN D-SUB RCPT 9POS R/A SLDR", Manufacturer=Assmann, Supplier Part Number=AE10921-ND, ComponentLink1Description=https://datasheet.ciiva.com/26927/getdatasheetpartid-755627-26927441.pdf?src-supplier=Verical, ComponentLink1URL=https://datasheet.ciiva.com/26927/getdatasheetpartid-755627-26927441.pdf?src-supplier=Verical, Height=12.68mm, Item Type="D-Sub Connectors", Lead Free=5697LeadFree, Manufacturer Part Number="A-DF 09 A/KG-T2S", Number of Contacts=9NUMBER, Pricing="1=0.78, 10=0.661, 25=0.6336, 40=0.62025, 90=0.59322, 270=0.53933, 450=0.4854, 990=0.43147, 2430=0.39102 (USD)", RoHS=Yes, Stock=23990, Supplier=Digikey
J18 J20: "1x4P 1 2mm Male pin 4 -25℃~+85℃ 2A Surface Mount SMD,P=2mm Wire To Board / Wire To Wire Connector ROHS / C3029442", LCSC Part Number=C3029442, ComponentLink1Description=LCSC, ComponentLink1URL=https://www.lcsc.com/product-detail/Wire-To-Board-Wire-To-Wire-Connector_XUNPU-WAFER-PH2-0-4PWB_C3029442.html, Item Type=Connector, Manuacturer=XUNPU, Manufacturer Part Number=WAFER-PH2.0-4PWB
J21 J22 J23 J24 J25 J26 J27 J28 J29: "1x3P 15A 300V Blue 14~22 Straight 5mm 1.5 1 3 Plugin,P=5mm Screw terminal ROHS", LCSC Part Number=C557652, Manufacturer="Ningbo Xinlaiya Elec", Package=Plugin,P=5mm, ComponentLink1Description=LCSC, ComponentLink1URL=https://www.lcsc.com/product-detail/Screw-terminal_Ningbo-Xinlaiya-Elec-XY301V-A-5-0-3P_C557652.html, Item Type="Screw terminal", Manufacturer Part Number=XY301V-A-5.0-3P
K1 K2 K3 K4 K5 K6 K7 K8 K9: "250V@AC 5V 15A SPDT (1 Form C) Plugin,15.6x19.2mm Power Relays ROHS", LCSC Part Number=C35449, Manufacturer="Ningbo Songle Relay", Package=Plugin,15.6x19.2mm, ComponentLink1Description=LCSC, ComponentLink1URL=https://www.lcsc.com/product-detail/Power-Relays_Ningbo-Songle-Relay-SRD-05VDC-SL-C_C35449.html, Item Type=Relays, Manufacturer Part Number=SRD-05VDC-SL-C
L1: library part MWSA1206S-4R7MT, "15A 4.7uH ±20% 24A SMD,13.5x12.6mm Power Inductors ROHS", LCSC Part Number=C408521, Manufacturer=Sunlord, Supplier Part Number=3442-MWSA1206S-4R7MTCT-ND, Item Type=Inductors, Manufacturer Part Number=MWSA1206S-4R7MT, Pricing="1=1.67, 10=1.417, 25=1.3056, 50=1.1666, 100=0.9721, 250=0.94436 (USD)", RoHS=No, Stock=195, Supplier=Digikey
LED1 LED2 LED3 LED4 LED5 LED6 LED7 LED8 LED9: "LED RED CLEAR CHIP SMD", Case Code (Imperial)=0603, Case Code (Metric)=1608, Color=Red, Forward Current=30mA, Forward Voltage=2.3V, Lens Color=Colorless, Manufacturer="Vishay Lite-On", Max Operating Temperature=85°C, Min Operating Temperature=-55°C, Package Quantity=3000, Power Dissipation=75mW, Reverse Voltage=5V, Supplier Part Number=160-1830-1-ND, Test Current=5mA, Case/Package=0603, ComponentLink1Description=https://datasheet.ciiva.com/11775/0900766b80dc0551-11775612.pdf?src-supplier=Rs, ComponentLink1URL=https://datasheet.ciiva.com/11775/0900766b80dc0551-11775612.pdf?src-supplier=Rs, ComponentLink2Description=https://datasheet.ciiva.com/4689/100-ltst-c193krkt-5a-61179-4689123.pdf?src-supplier=Mouser, ComponentLink2URL=https://datasheet.ciiva.com/4689/100-ltst-c193krkt-5a-61179-4689123.pdf?src-supplier=Mouser, ComponentLink3Description=https://datasheet.ciiva.com/16210/ltst-c193krkt-5a-16210822.pdf?src-supplier=Future+Electronics, ComponentLink3URL=https://datasheet.ciiva.com/16210/ltst-c193krkt-5a-16210822.pdf?src-supplier=Future+Electronics, ComponentLink4Description=https://datasheet.ciiva.com/2110/s-110-ltst-c193krkt-5a-2110272.pdf?src-supplier=Digikey, ComponentLink4URL=https://datasheet.ciiva.com/2110/s-110-ltst-c193krkt-5a-2110272.pdf?src-supplier=Digikey, Depth=0.8mm, Dominant Wavelength=631nm, Height=0.45mm, Illumination Color=Red, Item Type=LEDs, Lead Free="Lead Free", Length=1.6mm, Lens Size=0.8mm, Lens Style=Flat,Diffused,Colorless,Rectangular,Clear, Lens Transparency=Clear, Luminous Intensity=45mcd, Manufacturer Part Number=LTST-C193KRKT-5A, Mounting Technology="Surface Mount", Number of Elements=1, Number of LEDs=1, Packaging="Tape and Reel", Pins=2, Pricing="1=0.39, 10=0.211, 100=0.0981, 500=0.0906, 1000=0.07097, 2000=0.06946 (USD)", Radiation Hardening=No, RoHS=Yes, RoHS Compliant=Yes, Series=-, Stock=241564, Supplier=Digikey, Viewing Angle=130°, Wavelength=631nm, Width=0.8mm
Q1: "TRANS NPN 40V 0.6A SMD SOT23-3", Case/Package=SOT-23, Collector Base Voltage (VCBO)=75V, Collector Emitter Breakdown Voltage=40V, Collector Emitter Saturation Voltage=1V, Continuous Collector Current=600mA, Current=1A, Emitter Base Voltage (VEBO)=6V, Frequency=300MHz, LCSC Part Number=C94515, Manufacturer=Diodes, Max Operating Temperature=150°C, Max Power Dissipation=300mW, Min Operating Temperature=-55°C, Package Quantity=3000, Power Dissipation=350mW, Supplier Part Number 1=MMBT2222A-FDIDKR-ND, Collector Emitter Voltage (VCEO)=40V, ComponentLink1Description=http://www.diodes.com/datasheets/ds30041.pdf?src-supplier=Future+Electronics, ComponentLink1URL=http://www.diodes.com/datasheets/ds30041.pdf?src-supplier=Future+Electronics, ComponentLink2Description=http://www.diodes.com/datasheets/ds30041.pdf?src-supplier=Avnet, ComponentLink2URL=http://www.diodes.com/datasheets/ds30041.pdf?src-supplier=Avnet, ComponentLink3Description=https://www.verical.com/server-webapp/html/getDatasheet?partID=82692&src-supplier=Verical, ComponentLink3URL=https://www.verical.com/server-webapp/html/getDatasheet?partID=82692&src-supplier=Verical, ComponentLink4Description=https://www.diodes.com/assets/Datasheets/ds30041.pdf?src-supplier=Digi-Key, ComponentLink4URL=https://www.diodes.com/assets/Datasheets/ds30041.pdf?src-supplier=Digi-Key, ComponentLink5Description=http://www.diodes.com/datasheets/ds30041.pdf?src-supplier=Avnet+Europe, ComponentLink5URL=http://www.diodes.com/datasheets/ds30041.pdf?src-supplier=Avnet+Europe, ComponentLink6Description=http://www.diodes.com/datasheets/ds30041.pdf?src-supplier=Element14, ComponentLink6URL=http://www.diodes.com/datasheets/ds30041.pdf?src-supplier=Element14, Contact Plating=Matte,Tin, Current Rating=600mA, Element Configuration=Single, Gain Bandwidth Product=300MHz, Height=1mm, hFE Min=100, Item Type=Mosfet, Lead Free="Lead Free", Length=3.05mm, Manufacturer Part Number=MMBT2222A-7-F, Max Breakdown Voltage=40V, Max Collector Current=600mA, Max Frequency=300MHz, Mount="Surface Mount", Number of Elements=1, Number of Pins=3, Packaging="Tape and Reel", Polarity=NPN, Pricing 1="1=0.15, 10=0.134, 100=0.0729, 500=0.04486, 1000=0.03059 (USD)", Radiation Hardening=No, REACH SVHC="No SVHC", Stock 1=2471182, Supplier 1=Digi-Key, Termination=SMD/SMT, Transition Frequency=300MHz, Voltage=40V, Voltage Rating (DC)=40V, Weight=0.000282oz, Width=1.4mm
R1 R23: library part RK73G1JTTD1002F, "RES 10K OHM 1% 1/10W 0603", Case Code (Imperial)=0603, Case Code (Metric)=1608, LCSC Part Number=C362180, Max Operating Temperature=125°C, Min Operating Temperature=-55°C, Power Rating=100mW, Supplier Part Number=2019-RK73G1JTTD1002FCT-ND, Temperature Coefficient=50ppm/°C, Tolerance=1%, Voltage Rating=75V, Case/Package=0603, Category="Chip SMD Resistors", ComponentLink1Description=LCSC, ComponentLink2Description=http://www.mouser.com/ds/2/219/RK73G-9863.pdf?src-supplier=Mouser, ComponentLink2URL=http://www.mouser.com/ds/2/219/RK73G-9863.pdf?src-supplier=Mouser, Construction=Rectangular, Depth=0.8mm, Item Type=Resistor, Length=1.6mm, Military Standard=Not, Packaging="Tape and Reel", Pricing="1=0.22, 10=0.118, 50=0.0812, 100=0.0699, 500=0.0513, 1000=0.04545 (USD)", RoHS=Yes, RoHS Compliant=Yes, Series=RK73G, Stock=249394, Supplier=Digi-Key, Termination=SMD/SMT
R2: library part RC0603FR-074K7L, "RES SMD 4.7K OHM 1% 1/10W 0603", LCSC Part Number=C99782, Manufacturer=Yageo, Package=0603, ComponentLink7Description=LCSC, ComponentLink7URL=https://www.lcsc.com/product-detail/Chip-Resistor-Surface-Mount_YAGEO-RC0603FR-074K7L_C99782.html, Item Type=Resistor, Manufacturer Part Number=RC0603FR-074K7L
R3: library part 0603WAF1002T5E, "100mW Thick Film Resistors 75V ±100ppm/℃ ±1% 10kΩ 0603 Chip Resistor - Surface Mount ROHS", LCSC Part Number=C25804, Manufacturer="UNI-ROYAL(Uniroyal Elec)", Package=0603, ComponentLink1Description=LCSC, ComponentLink1URL=https://www.lcsc.com/product-detail/Chip-Resistor-Surface-Mount_UNI-ROYAL-Uniroyal-Elec-0603WAF1002T5E_C25804.html, Item Type=Resistor, Manufacturer Part Number=0603WAF1002T5E
R6 R7 R8 R9 R11 R13 R14 R15 R18: library part CRCW0603220RFKEA, "RES SMD 220 OHM 1% 1/10W 0603", Case Code (Imperial)=0603, Case Code (Metric)=1608, LCSC Part Number=C844757, Max Operating Temperature=155°C, Max Power Dissipation=100mW, Min Operating Temperature=-55°C, Package Quantity=5000, Ratings=AEC-Q200, Resistance Tolerance=1%, Resistor Type="Thick Film", Supplier Part Number=71-CRCW0603-220-E3, Temperature Coefficient=100ppm/°C, Voltage Rating=75V, Case/Package=0603, Category="Chip SMD Resistors", ComponentLink1Description=LCSC, ComponentLink2Description=https://datasheet.ciiva.com/11810/0900766b80d98afc-11810631.pdf?src-supplier=Rs, ComponentLink2URL=https://datasheet.ciiva.com/11810/0900766b80d98afc-11810631.pdf?src-supplier=Rs, ComponentLink3Description=https://datasheet.ciiva.com/8339/dcrcwe3-8339957.pdf?src-supplier=Avnet, ComponentLink3URL=https://datasheet.ciiva.com/8339/dcrcwe3-8339957.pdf?src-supplier=Avnet, ComponentLink4Description=https://datasheet.ciiva.com/16222/dcrcwe3-16222278.pdf?src-supplier=Future+Electronics, ComponentLink4URL=https://datasheet.ciiva.com/16222/dcrcwe3-16222278.pdf?src-supplier=Future+Electronics, ComponentLink5Description=https://datasheet.ciiva.com/7777/1697337-7777301.pdf?src-supplier=Element14, ComponentLink5URL=https://datasheet.ciiva.com/7777/1697337-7777301.pdf?src-supplier=Element14, ComponentLink6Description=https://datasheet.ciiva.com/16763/70201119-16763287.pdf?src-supplier=Allied+Electronics, ComponentLink6URL=https://datasheet.ciiva.com/16763/70201119-16763287.pdf?src-supplier=Allied+Electronics, ComponentLink7Description=https://datasheet.ciiva.com/2466/dcrcwe3-2466464.pdf?src-supplier=Digi-Key, ComponentLink7URL=https://datasheet.ciiva.com/2466/dcrcwe3-2466464.pdf?src-supplier=Digi-Key, ComponentLink8Description=https://datasheet.ciiva.com/2466/dcrcwe3-2466465.pdf?src-supplier=Digi-Key, ComponentLink8URL=https://datasheet.ciiva.com/2466/dcrcwe3-2466465.pdf?src-supplier=Digi-Key, ComponentLink9Description=https://datasheet.ciiva.com/2466/dcrcwe3-2466466.pdf?src-supplier=Digi-Key, ComponentLink9URL=https://datasheet.ciiva.com/2466/dcrcwe3-2466466.pdf?src-supplier=Digi-Key, ComponentLink10Description=https://datasheet.ciiva.com/7777/1720486-7777551.pdf?src-supplier=Element14, ComponentLink10URL=https://datasheet.ciiva.com/7777/1720486-7777551.pdf?src-supplier=Element14, ComponentLink11Description=https://datasheet.ciiva.com/26316/fld-crcw-e3-data-en-26316574.pdf?src-supplier=Distrelec, ComponentLink11URL=https://datasheet.ciiva.com/26316/fld-crcw-e3-data-en-26316574.pdf?src-supplier=Distrelec, ComponentLink12Description=https://datasheet.ciiva.com/5550/dcrcwe3-109170-5550773.pdf?src-supplier=Mouser, ComponentLink12URL=https://datasheet.ciiva.com/5550/dcrcwe3-109170-5550773.pdf?src-supplier=Mouser, ComponentLink13Description=https://datasheet.ciiva.com/15159/getdatasheetpartid-45816-15159565.pdf?src-supplier=Verical, ComponentLink13URL=https://datasheet.ciiva.com/15159/getdatasheetpartid-45816-15159565.pdf?src-supplier=Verical, Construction=Rectangular, Contact Plating=Tin, Depth=0.85mm, Features="Automotive AEC-Q200", Height=0.45mm, Item Type=Resistor, Lead Free="Lead Free", Length=1.55mm, Military Standard=Not, Number of Terminations=2, Packaging="Tape and Reel", Power Rating=100mW, Pricing="1=0.1, 10=0.017, 50=0.017, 100=0.01, 1000=0.008, 10000=0.004 (USD)", Radiation Hardening=No, Reach SVHC Compliant=Unknown, RoHS=Yes, RoHS Compliant=Yes, Series=CRCW, Stock=40706, Supplier=Mouser, Technology="THICK FILM", Termination=SMD/SMT, Tolerance=1%, Voltage Rating (DC)=75V, Weight=7.1E-05oz, Width=0.85mm
R19: library part RC0603FR-0730KL, "RES 30K OHM 1% 1/10W 0603", LCSC Part Number=C100001, Supplier Part Number 1=311-30.0KHRCT-ND, Supplier 1=Digi-Key
R20: library part CRCW04024K12FKED, "RES SMD 4.12K OHM 1% 1/16W 0402", Case Code (Imperial)=0402, Case Code (Metric)=1005, Manufacturer=Vishay, Max Operating Temperature=155°C, Max Power Dissipation=63mW, Min Operating Temperature=-55°C, Package Quantity=10000, Ratings=AEC-Q200, Resistance Tolerance=1%, Resistor Type="Thick Film", Supplier Part Number=71-CRCW0402-4.12K-E3, Temperature Coefficient=100ppm/°C, Voltage Rating=50V, Case/Package=0402, ComponentLink1Description=https://datasheet.ciiva.com/11818/0900766b80d98824-11818084.pdf?src-supplier=Rs, ComponentLink1URL=https://datasheet.ciiva.com/11818/0900766b80d98824-11818084.pdf?src-supplier=Rs, ComponentLink2Description=https://datasheet.ciiva.com/9074/dcrcwe3-9074703.pdf?src-supplier=Avnet, ComponentLink2URL=https://datasheet.ciiva.com/9074/dcrcwe3-9074703.pdf?src-supplier=Avnet, ComponentLink3Description=https://datasheet.ciiva.com/7679/1533075-7679254.pdf?src-supplier=Element14, ComponentLink3URL=https://datasheet.ciiva.com/7679/1533075-7679254.pdf?src-supplier=Element14, ComponentLink4Description=https://datasheet.ciiva.com/2463/dcrcwe3-2463731.pdf?src-supplier=Digikey, ComponentLink4URL=https://datasheet.ciiva.com/2463/dcrcwe3-2463731.pdf?src-supplier=Digikey, ComponentLink5Description=https://datasheet.ciiva.com/2463/dcrcwe3-2463732.pdf?src-supplier=Digikey, ComponentLink5URL=https://datasheet.ciiva.com/2463/dcrcwe3-2463732.pdf?src-supplier=Digikey, ComponentLink6Description=https://datasheet.ciiva.com/2463/dcrcwe3-2463730.pdf?src-supplier=Digikey, ComponentLink6URL=https://datasheet.ciiva.com/2463/dcrcwe3-2463730.pdf?src-supplier=Digikey, ComponentLink7Description=https://datasheet.ciiva.com/16758/70201119-16758669.pdf?src-supplier=Allied+Electronics, ComponentLink7URL=https://datasheet.ciiva.com/16758/70201119-16758669.pdf?src-supplier=Allied+Electronics, ComponentLink8Description=https://datasheet.ciiva.com/22871/70201119-22871725.pdf?src-supplier=Allied+Electronics, ComponentLink8URL=https://datasheet.ciiva.com/22871/70201119-22871725.pdf?src-supplier=Allied+Electronics, Contact Plating=Tin, Depth=0.5mm, Features="Automotive AEC-Q200", Height=0.35mm, Item Type=Resistor, Lead Free="Lead Free", Length=1mm, Manufacturer Part Number=CRCW04024K12FKED, Number of Terminations=2, Packaging="Tape and Reel", Pins=2, Power Rating=63mW, Pricing="1=0.1, 10=0.017, 50=0.017, 100=0.01, 1000=0.008, 10000=0.004 (USD)", Radiation Hardening=No, Reach SVHC Compliant=Unknown, RoHS=Yes, RoHS Compliant=Yes, Series=CRCW, Stock=17765, Supplier=Mouser, Technology="THICK FILM", Termination=SMD/SMT, Tolerance=1%, Voltage Rating (DC)=50V, Weight=2.3E-05oz, Width=0.5mm
R21: library part RT0402BRD0730K1L, "RES SMD 30.1KOHM 0.1% 1/16W 0402", LCSC Part Number=C852714, Manufacturer=Yageo, Supplier Part Number=1991324P, Category="Chip SMD Resistors", ComponentLink1Description=https://datasheet.ciiva.com/12722/pyu-rt-1-to-0-05-rohs-l-4-12722119.pdf?src-supplier=Mouser, ComponentLink1URL=https://datasheet.ciiva.com/12722/pyu-rt-1-to-0-05-rohs-l-4-12722119.pdf?src-supplier=Mouser, ComponentLink2Description=https://datasheet.ciiva.com/2582/pyu-rt-1-to-0-05-rohs-l-5-2582303.pdf?src-supplier=Digi-Key, ComponentLink2URL=https://datasheet.ciiva.com/2582/pyu-rt-1-to-0-05-rohs-l-5-2582303.pdf?src-supplier=Digi-Key, Item Type=Resistor, Manufacturer Part Number=RT0402BRD0730K1L, Pricing="100=0.138, 250=0.115, 500=0.092, 1000=0.076 (GBP)", RoHS=Yes, Stock=7420, Supplier=Rs
R25: library part RT0603BRD071K1L, "RES SMD 1.1K OHM 0.1% 1/10W 0603", Case Code (Imperial)=0603, Case Code (Metric)=1608, LCSC Part Number=C705736, Manufacturer=Yageo, Max Operating Temperature=125°C, Max Power Dissipation=100mW, Min Operating Temperature=-55°C, Package Quantity=5000, Resistance=1.1kR, Resistor Type="Thin Film", Supplier Part Number 1=1991436, Temperature Coefficient=25ppm/°C, Tolerance=0.1%, Voltage Rating=75V, Voltage Rating (DC)=50V, Case/Package=0603, Category="Chip SMD Resistors", ComponentLink1Description=https://datasheet.ciiva.com/12725/pyu-rt-1-to-0-05-rohs-l-4-12725819.pdf?src-supplier=Mouser, ComponentLink1URL=https://datasheet.ciiva.com/12725/pyu-rt-1-to-0-05-rohs-l-4-12725819.pdf?src-supplier=Mouser, ComponentLink2Description=https://datasheet.ciiva.com/2585/pyu-rt-1-to-0-05-rohs-l-4-2585740.pdf?src-supplier=Digi-Key, ComponentLink2URL=https://datasheet.ciiva.com/2585/pyu-rt-1-to-0-05-rohs-l-4-2585740.pdf?src-supplier=Digi-Key, ComponentLink3Description=https://datasheet.ciiva.com/8895/pyu-rt-1-to-0-05-rohs-l-4-8895949.pdf?src-supplier=Avnet, ComponentLink3URL=https://datasheet.ciiva.com/8895/pyu-rt-1-to-0-05-rohs-l-4-8895949.pdf?src-supplier=Avnet, Contact Plating=Tin,Matte, Features="Moisture Resistant", Height=0.022inch, Item Type=Resistor, Lead Free="Lead Free", Length=0.063inch, Manufacturer Part Number=RT0603BRD071K1L, Number of Terminations=2, Packaging="Tape and Reel", Power Rating=100mW, Pricing 1="10=0.23500, 100=0.21900, 250=0.20400, 500=0.19000, 1000=0.17400 (GBP)", Radiation Hardening=No, RoHS=Yes, RoHS Compliant=Yes, Series=RT, Stock 1=7030, Supplier 1=Rs, Termination=SMD/SMT, Width=0.031inch
U1 U2: "IC PWR RELAY 7NPN 1:1 16SOIC", Manufacturer="Texas Instruments", Supplier Part Number=595-ULN2003AIDR, ComponentLink1Description=https://datasheet.ciiva.com/15139/getdatasheetpartid-47948-15139878.pdf?src-supplier=Verical, ComponentLink1URL=https://datasheet.ciiva.com/15139/getdatasheetpartid-47948-15139878.pdf?src-supplier=Verical, ComponentLink2Description=https://datasheet.ciiva.com/14424/ulq2003a-14424030.pdf?src-supplier=Avnet, ComponentLink2URL=https://datasheet.ciiva.com/14424/ulq2003a-14424030.pdf?src-supplier=Avnet, ComponentLink3Description=https://datasheet.ciiva.com/1700/uln2003ai-1700820.pdf?src-supplier=Digikey, ComponentLink3URL=https://datasheet.ciiva.com/1700/uln2003ai-1700820.pdf?src-supplier=Digikey, ComponentLink4Description=https://datasheet.ciiva.com/1700/uln2003ai-1700821.pdf?src-supplier=Digikey, ComponentLink4URL=https://datasheet.ciiva.com/1700/uln2003ai-1700821.pdf?src-supplier=Digikey, ComponentLink5Description=https://datasheet.ciiva.com/1700/uln2003ai-1700822.pdf?src-supplier=Digikey, ComponentLink5URL=https://datasheet.ciiva.com/1700/uln2003ai-1700822.pdf?src-supplier=Digikey, Item Type=IC, Manufacturer Part Number=ULN2003AIDR, Pricing="1=0.66, 10=0.589, 50=0.589, 100=0.402, 1000=0.285, 10000=0.232 (USD)", RoHS=Yes, Stock=2012, Supplier=Mouser
U3: "IC REG LIN 12V 1.5A DDPAK/TO263", Manufacturer="TI National Semiconductor", Supplier Part Number=926-LM340SX-12/NOPB, ComponentLink1Description=https://datasheet.ciiva.com/15111/getdatasheetpartid-88734-15111564.pdf?src-supplier=Verical, ComponentLink1URL=https://datasheet.ciiva.com/15111/getdatasheetpartid-88734-15111564.pdf?src-supplier=Verical, ComponentLink2Description=https://datasheet.ciiva.com/27051/1271515-27051800.pdf?src-supplier=Jameco, ComponentLink2URL=https://datasheet.ciiva.com/27051/1271515-27051800.pdf?src-supplier=Jameco, ComponentLink3Description=https://datasheet.ciiva.com/41458/001014071-da-01-en-ic-reg-ldo-lm340sx-12-nopb-to-263-3-tid-41458271.pdf?src-supplier=Conrad, ComponentLink3URL=https://datasheet.ciiva.com/41458/001014071-da-01-en-ic-reg-ldo-lm340sx-12-nopb-to-263-3-tid-41458271.pdf?src-supplier=Conrad, ComponentLink4Description=https://datasheet.ciiva.com/3225/lm340-n-3225397.pdf?src-supplier=Avnet, ComponentLink4URL=https://datasheet.ciiva.com/3225/lm340-n-3225397.pdf?src-supplier=Avnet, ComponentLink5Description=https://datasheet.ciiva.com/6582/lm340-n-6582405.pdf?src-supplier=Digikey, ComponentLink5URL=https://datasheet.ciiva.com/6582/lm340-n-6582405.pdf?src-supplier=Digikey, ComponentLink6Description=https://datasheet.ciiva.com/6582/lm340-n-6582409.pdf?src-supplier=Digikey, ComponentLink6URL=https://datasheet.ciiva.com/6582/lm340-n-6582409.pdf?src-supplier=Digikey, Item Type=IC, Manufacturer Part Number=LM340SX-12/NOPB, Pricing="1=1.86, 10=1.59, 50=1.59, 100=1.34, 1000=0.921, 10000=0.794 (USD)", RoHS=Yes, Stock=1516, Supplier=Mouser
U4: "4.5V TO 28V INPUT, 8A SYNCHRONOU", Manufacturer="Texas Instruments", Supplier Part Number=595-TPS56837HRPAR, Height=1mm, Item Type=IC, Length=3mm, Manufacturer Part Number=TPS56837HRPAR, Pins=10, Pricing="1=2.74, 10=2.46, 50=2.46, 100=1.97, 1000=1.34, 10000=1.2 (USD)", RoHS=No, Stock=4990, Supplier=Mouser, Thickness=900um, Width=3mm

## Free pads (board coordinates)
  round 3 hole 3 unplated paste+0: ""(0,0) ""(0.127,187.198) ""(0.254,45.72) ""(0.508,65.786) ""(0.762,73.66) ""(0.762,98.806) ""(25.146,24.384) ""(25.273,37.465) ""(25.736,65.788) ""(25.781,46.101) ""(35.687,73.66) ""(35.687,98.806) ""(50.927,72.644) ""(50.927,107.569) ""(51.054,0.508) ""(51.054,35.433) ""(76.073,72.644) ""(76.073,107.569) ""(76.073,187.325) ""(76.2,0.508) ""(76.2,35.433) ""(83.439,72.644) ""(83.439,107.569) ""(83.566,0.508) ""(83.566,35.433) ""(108.585,72.644) ""(108.585,107.569) ""(108.712,0.508) ""(108.712,35.433) ""(118.364,19.685) ""(133.223,19.685) ""(137.922,75.946) ""(137.922,100.457) ""(141.478,21.209) ""(162.433,21.082) ""(162.814,75.946) ""(162.814,100.457) ""(193.421,154.432) ""(193.675,0)

## Via types
v1: diameter 0.6, hole 0.3, Top Layer to Bottom Layer, 267 vias

## Nets (pads, with @x,y where several pads share a name; then routed paths per layer and width w, separated by ;. In a path a pad name is that pad's centre, name@x,y a point inside that pad or via, vN(x,y) a via of type N, cw(c..) or ccw(c..) an arc to the next point about the centre after c; other vN are vias at no path point)
3V3: J14.1 J14.17 J25.2 J28.2 J29.2 K3.5 K5.5 K9.5 R2.1 R3.1 R23.1 | length 12.4
  Top Layer w0.381: R2.1@3.785,24.207 v1(9.22,24.207) ; R3.1@10.033,7.366 v1(10.033,10.721) ; v1(26.06,10.661) R23.1@29.591,10.661
  Top Layer w0.762: J14.17@180.442,54.102 J14.17@180.466,54.126
  other v1: 183.566,61.722 183.566,63.144 178.392,75.641 180.071,75.641 181.749,75.641
5V: J14.2 J14.4 J17.1 J18.1 J19.1 R1.2 | length 190.2
  Top Layer w0.381: v1(26.06,7.264) R1.2@29.21,7.264
  Top Layer w0.762: 181.331,82.499 181.178,82.652 181.178,97.968 181.788,98.577 184.125,98.577 J18.1@184.15,98.552
  Bottom Layer w0.508: 18.669,81.763 19.634,82.728 21.082,82.728
  Bottom Layer w0.762: v1(26.06,7.264) 87.503,7.264 90.094,9.855 90.094,60.477 v1(90.145,60.528)
  Bottom Layer w1.2: J17.1@8.024,152.682 2.881,147.539 2.881,112.806 4.421,111.265 7.81,111.265 9.282,112.738
  other v1: 86.335,60.528 88.189,60.528 84.353,82.423 85.776,82.423
5V_EX: C8.2 C9.2 C10.2 C12.2 C13.2 C14.2 C15.2 C16.2 C17.2 C18.2 C19.2 C20.2 J3.2 J10.A9 J10.B9 J12.2 J17.6 J19.6 J21.2 J22.2 J23.2 J27.2 K1.4 K1.5 K2.4 K2.5 K3.4 K4.4 K4.5 K5.4 K6.4 K6.5 K7.4 K8.4 K9.4 L1.2 R19.2 U1.9 U2.9 | length 32.6
  Top Layer w0.254: C8.2@32.868,132.016 33.426,132.016 33.998,132.588 R19.2@34.061,132.588 v1(34.061,133.988)
  Top Layer w0.762: J3.2@45.593,128.707 v1(45.593,134.62)
  Bottom Layer w0.254: v1(26.503,151.638) 26.503,136.336 28.851,133.988 v1(34.061,133.988)